# Altium PCB NB3000XN.PcbDoc (part 1 of 71)
Units mil, origin at the board's own origin, x right, y up, seen from the top; angles counter-clockwise.
Board outline 9527.56 x 6929.77 mil, 6 copper layers (Top Layer, GND+SHIELD, MidLayer1, MidLayer2, P2 - 3V3+5V0, Bottom Layer), stack 62.375 mil thick; 832 components, 1027 nets, 4655 pads, 4981 vias.
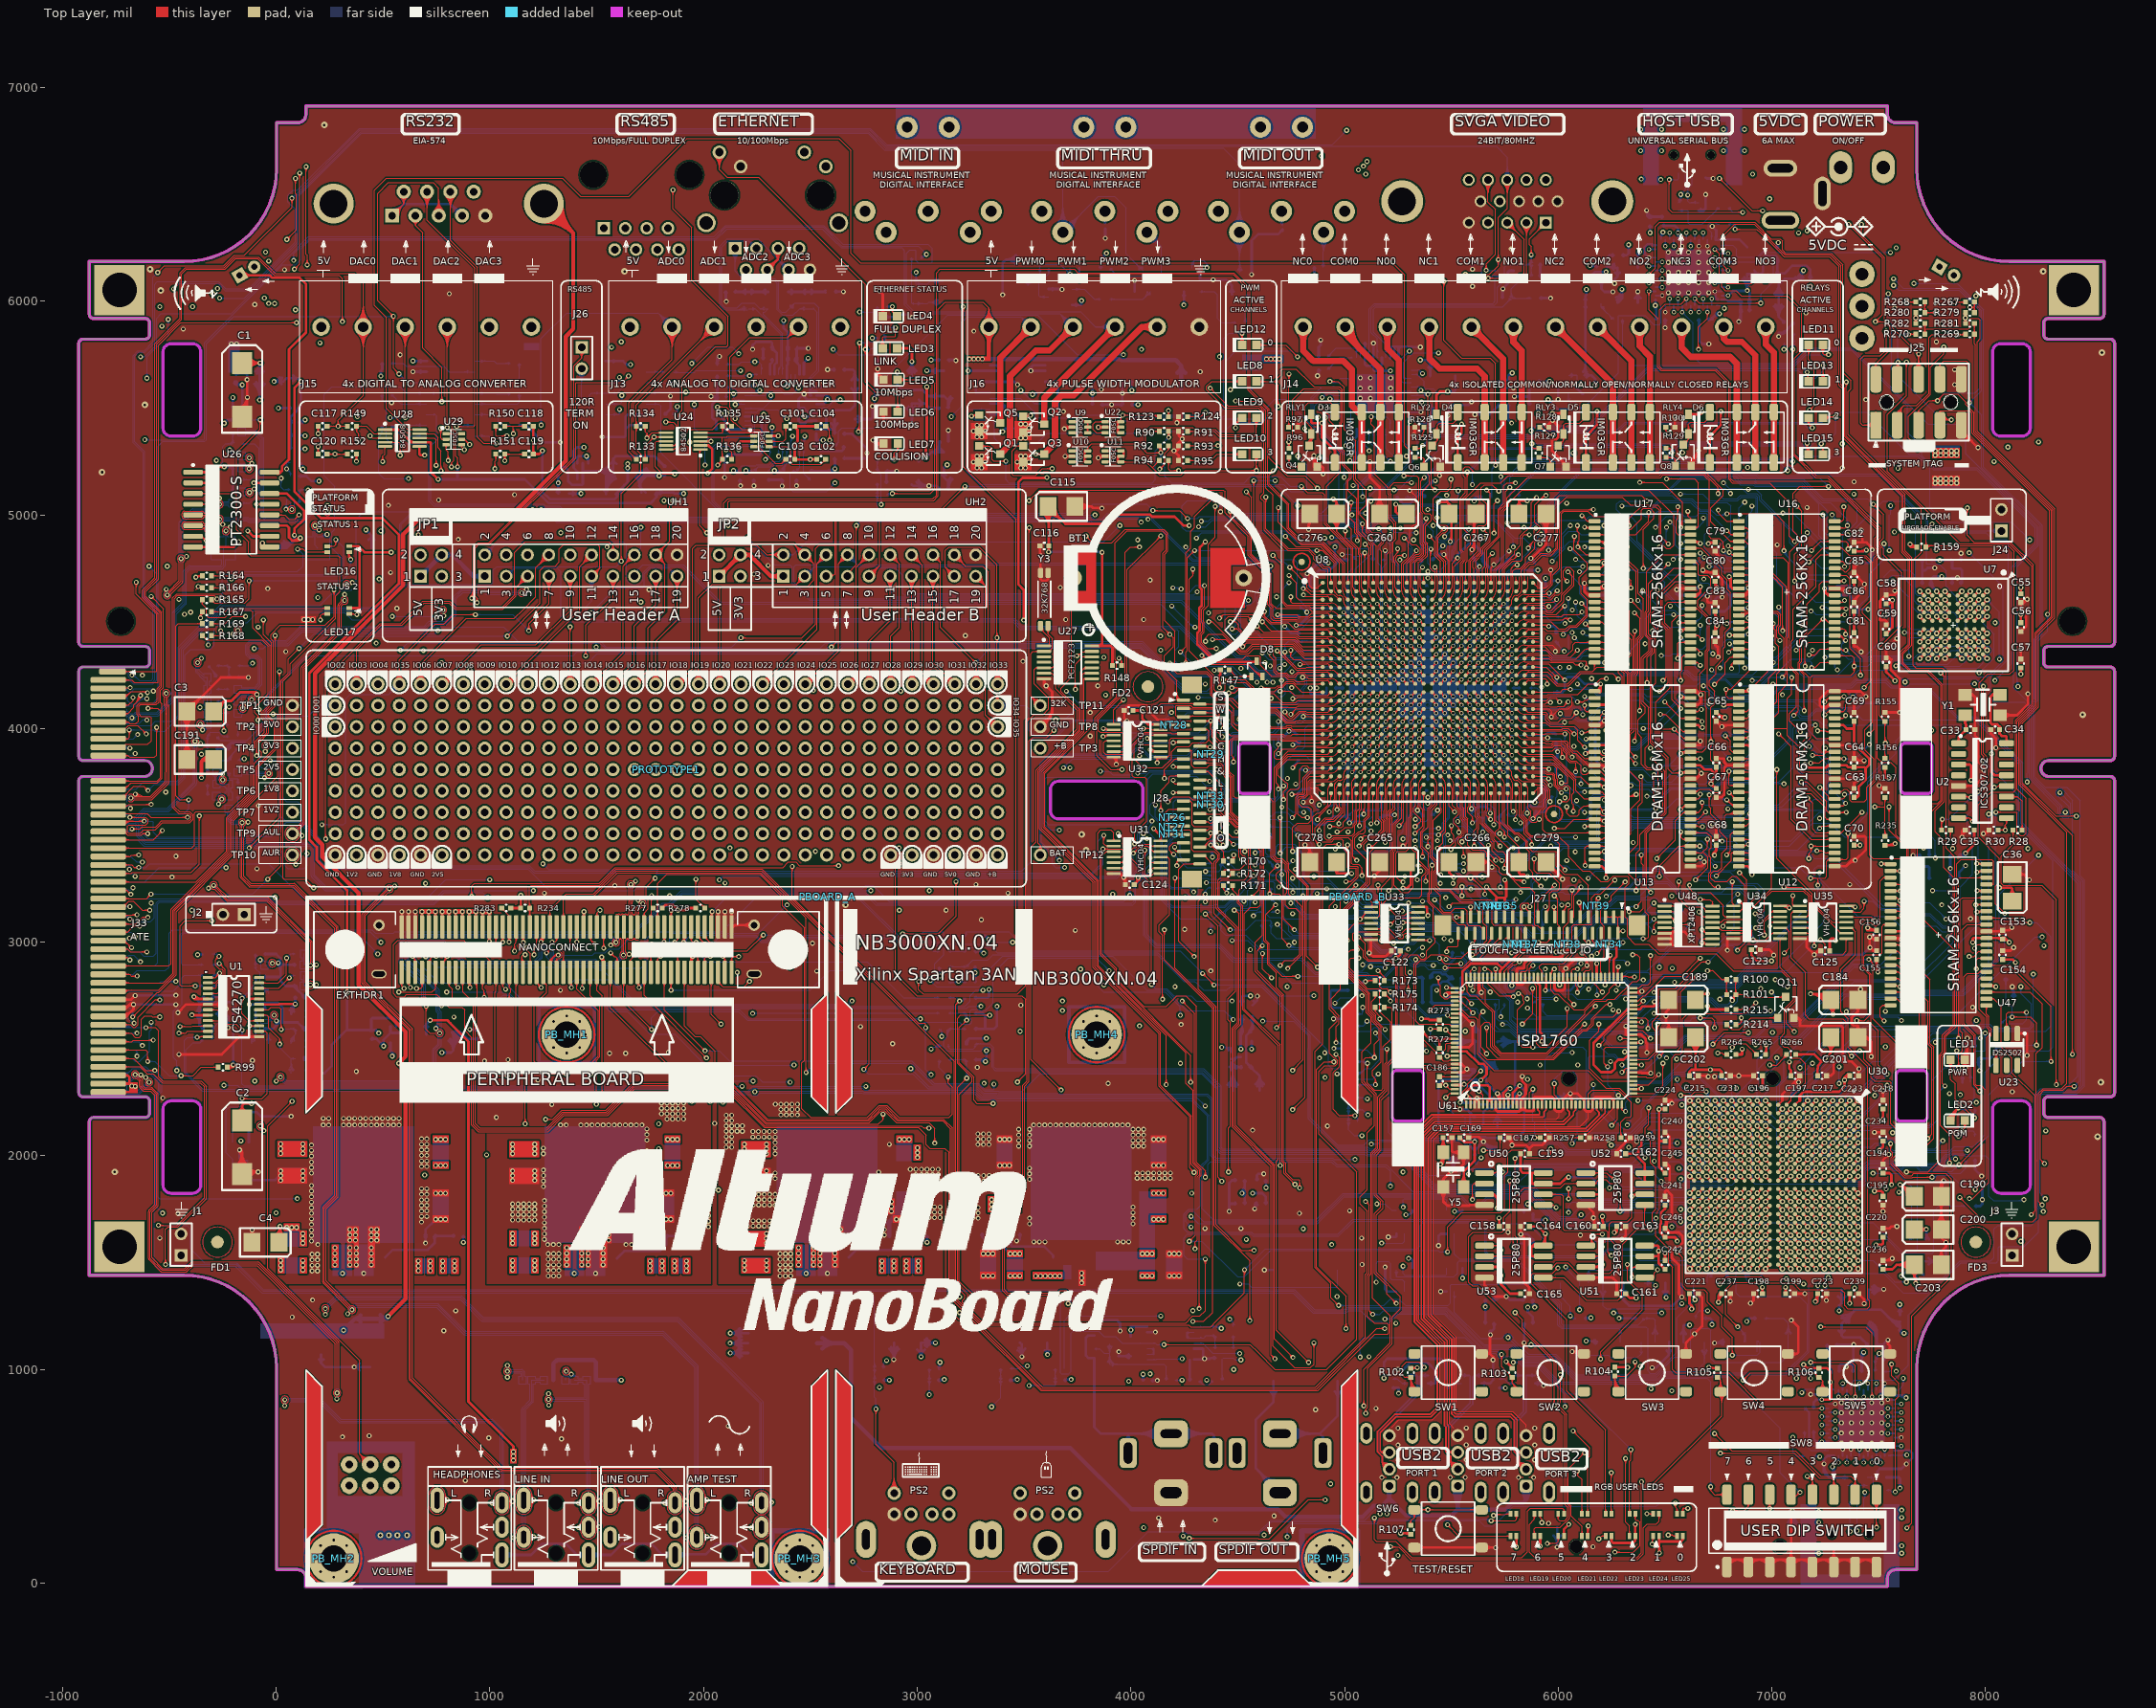
[diagram p0: Top Layer view]
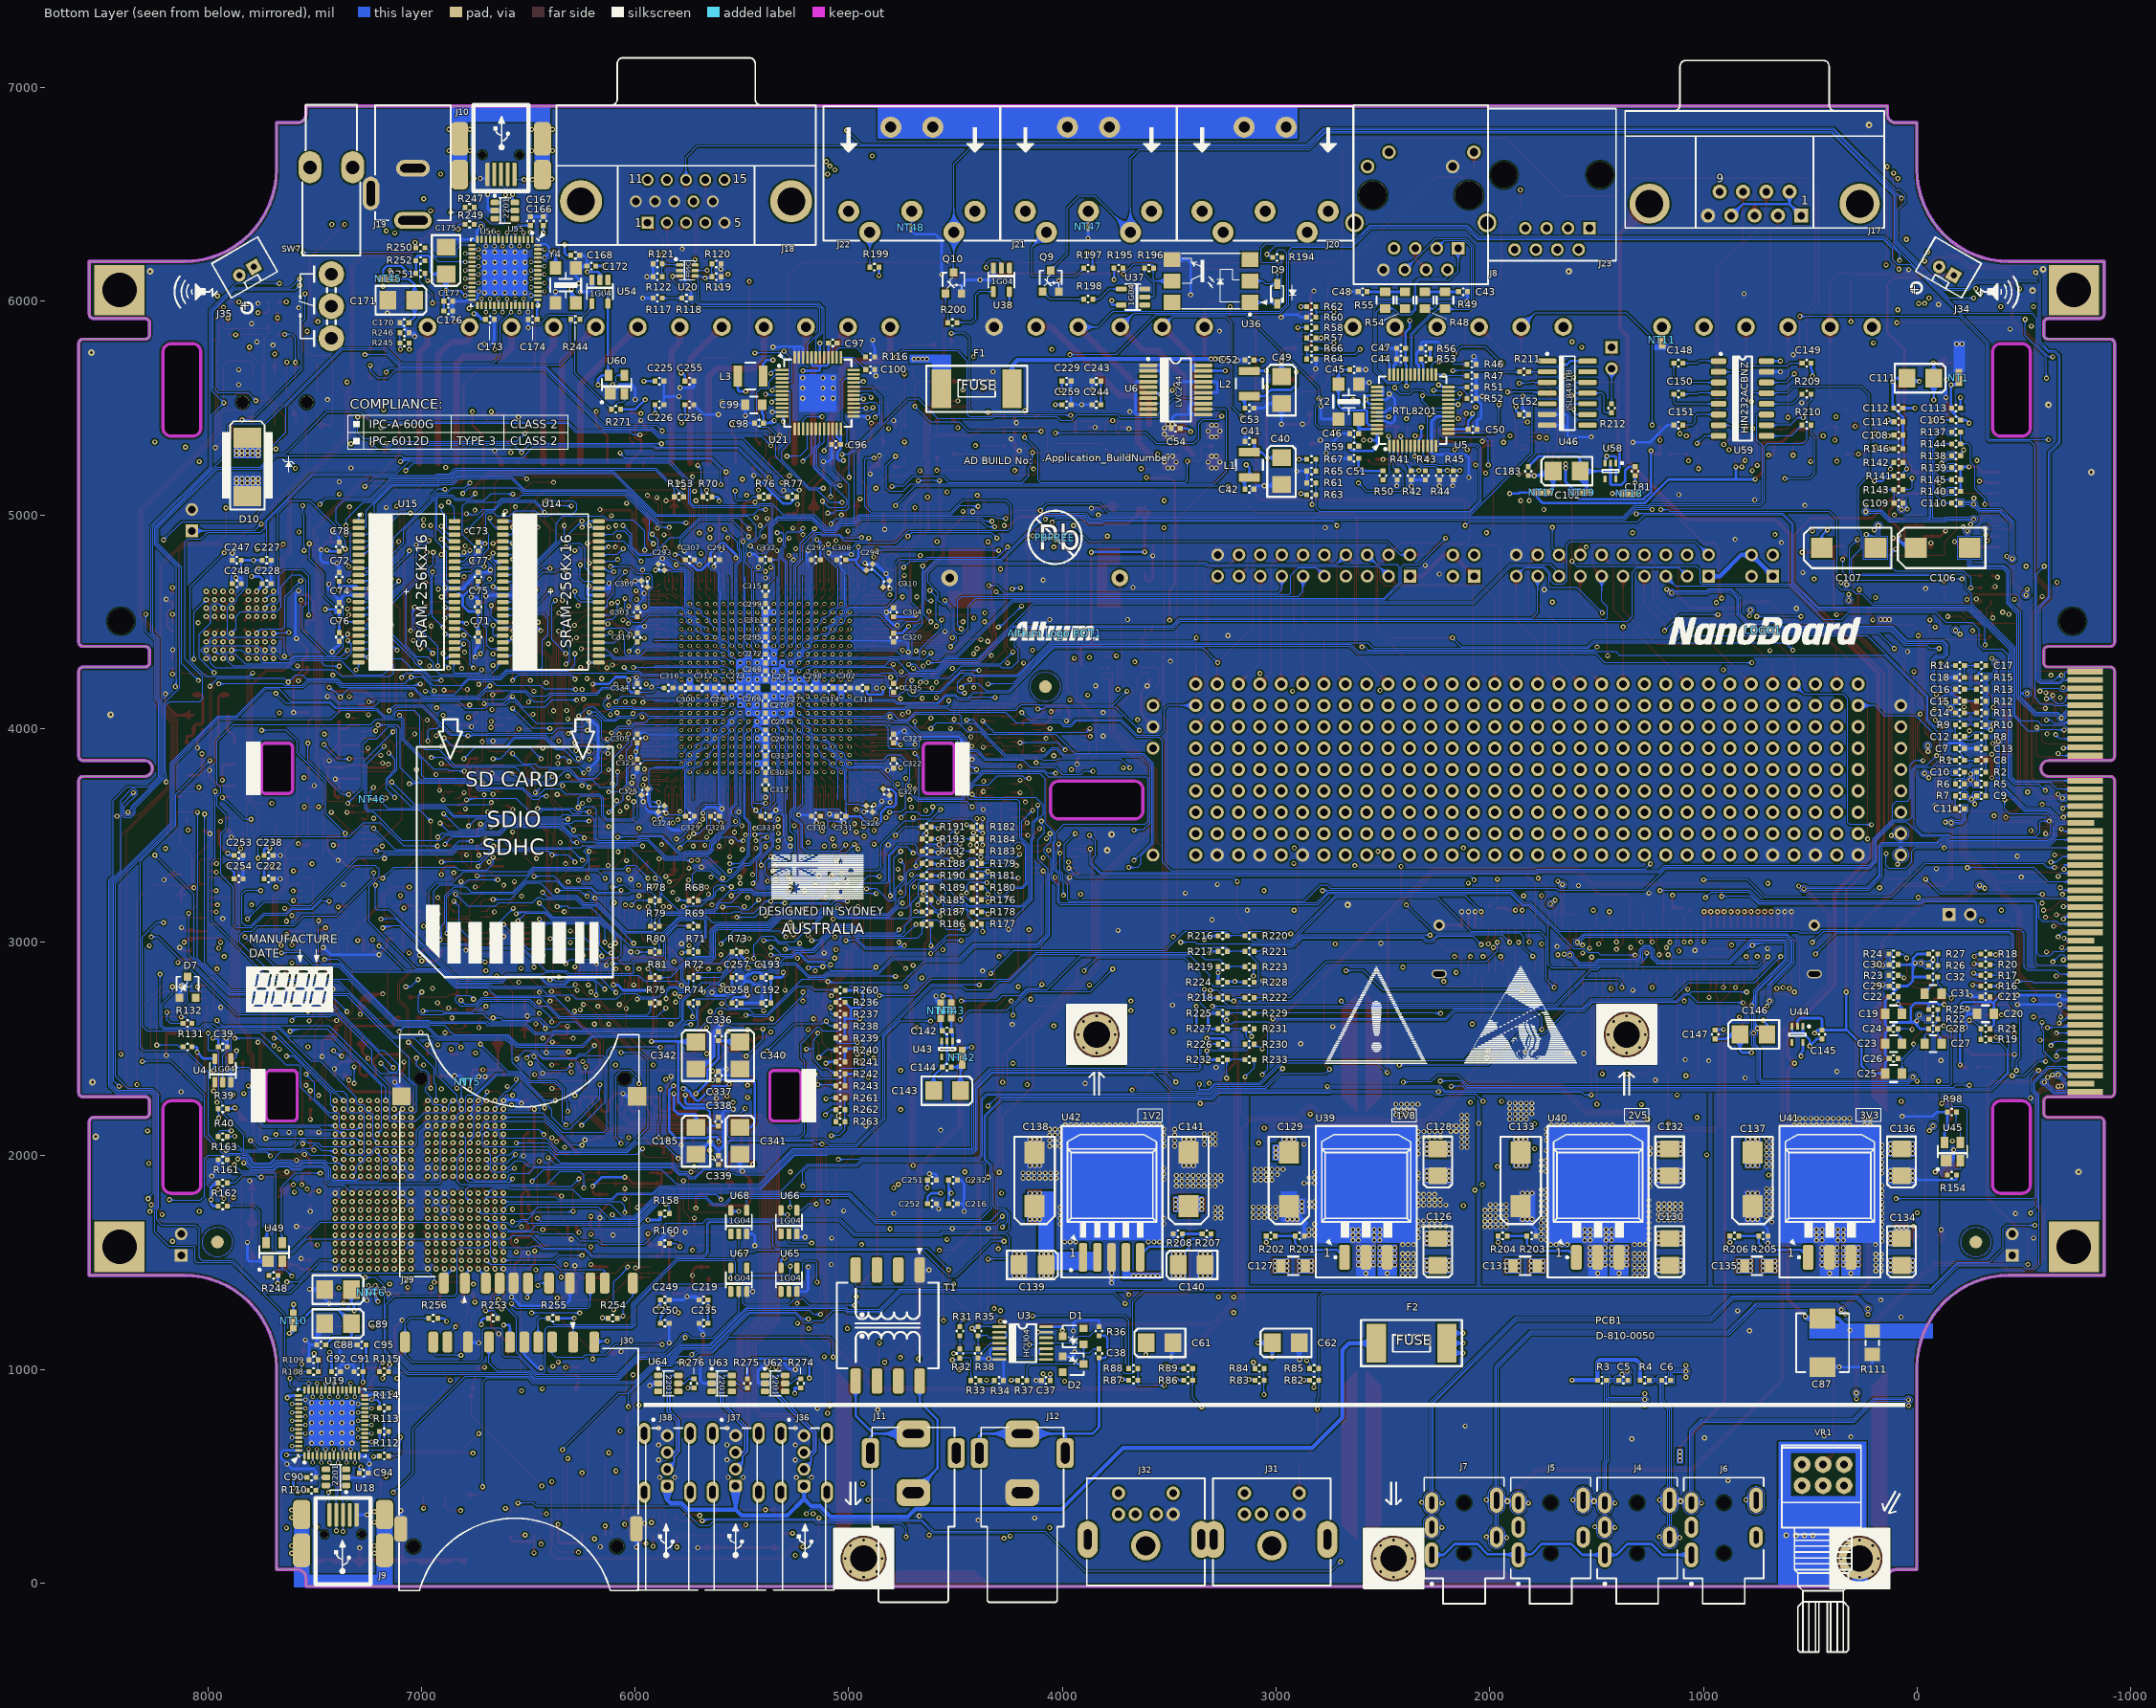
[diagram p1: Bottom Layer view, seen from below]
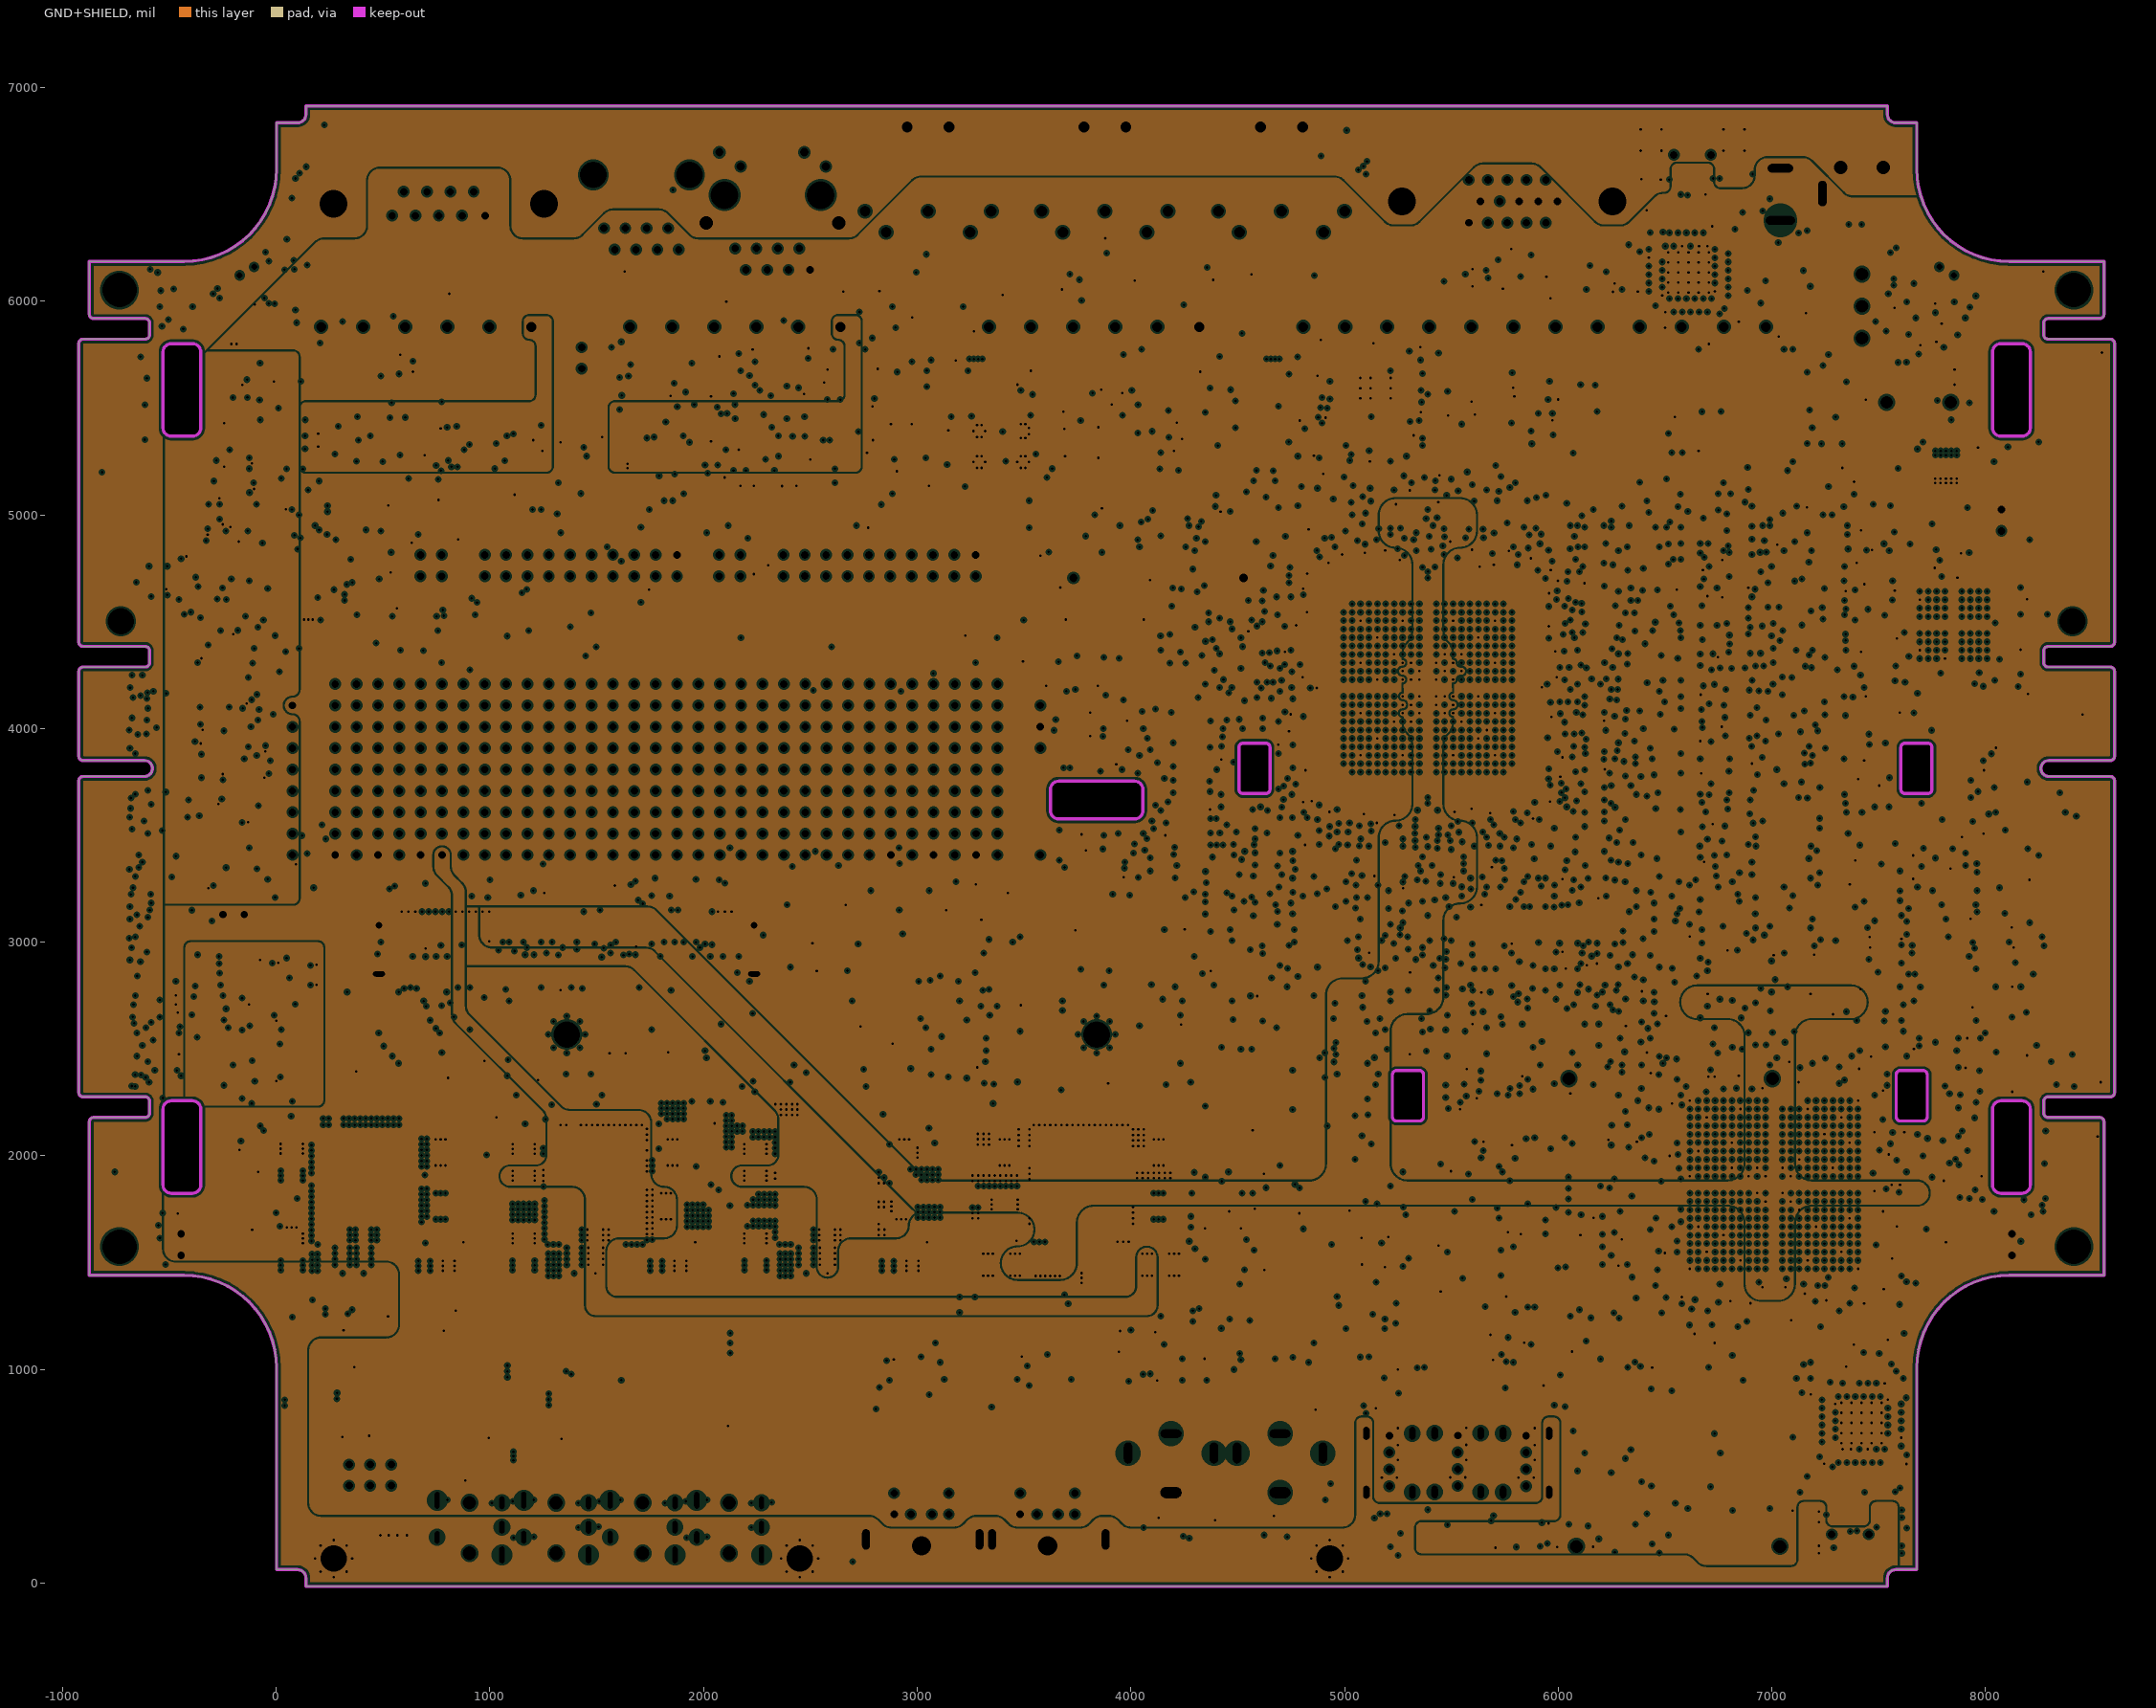
[diagram p2: GND+SHIELD, clearances drawn from the general rule]
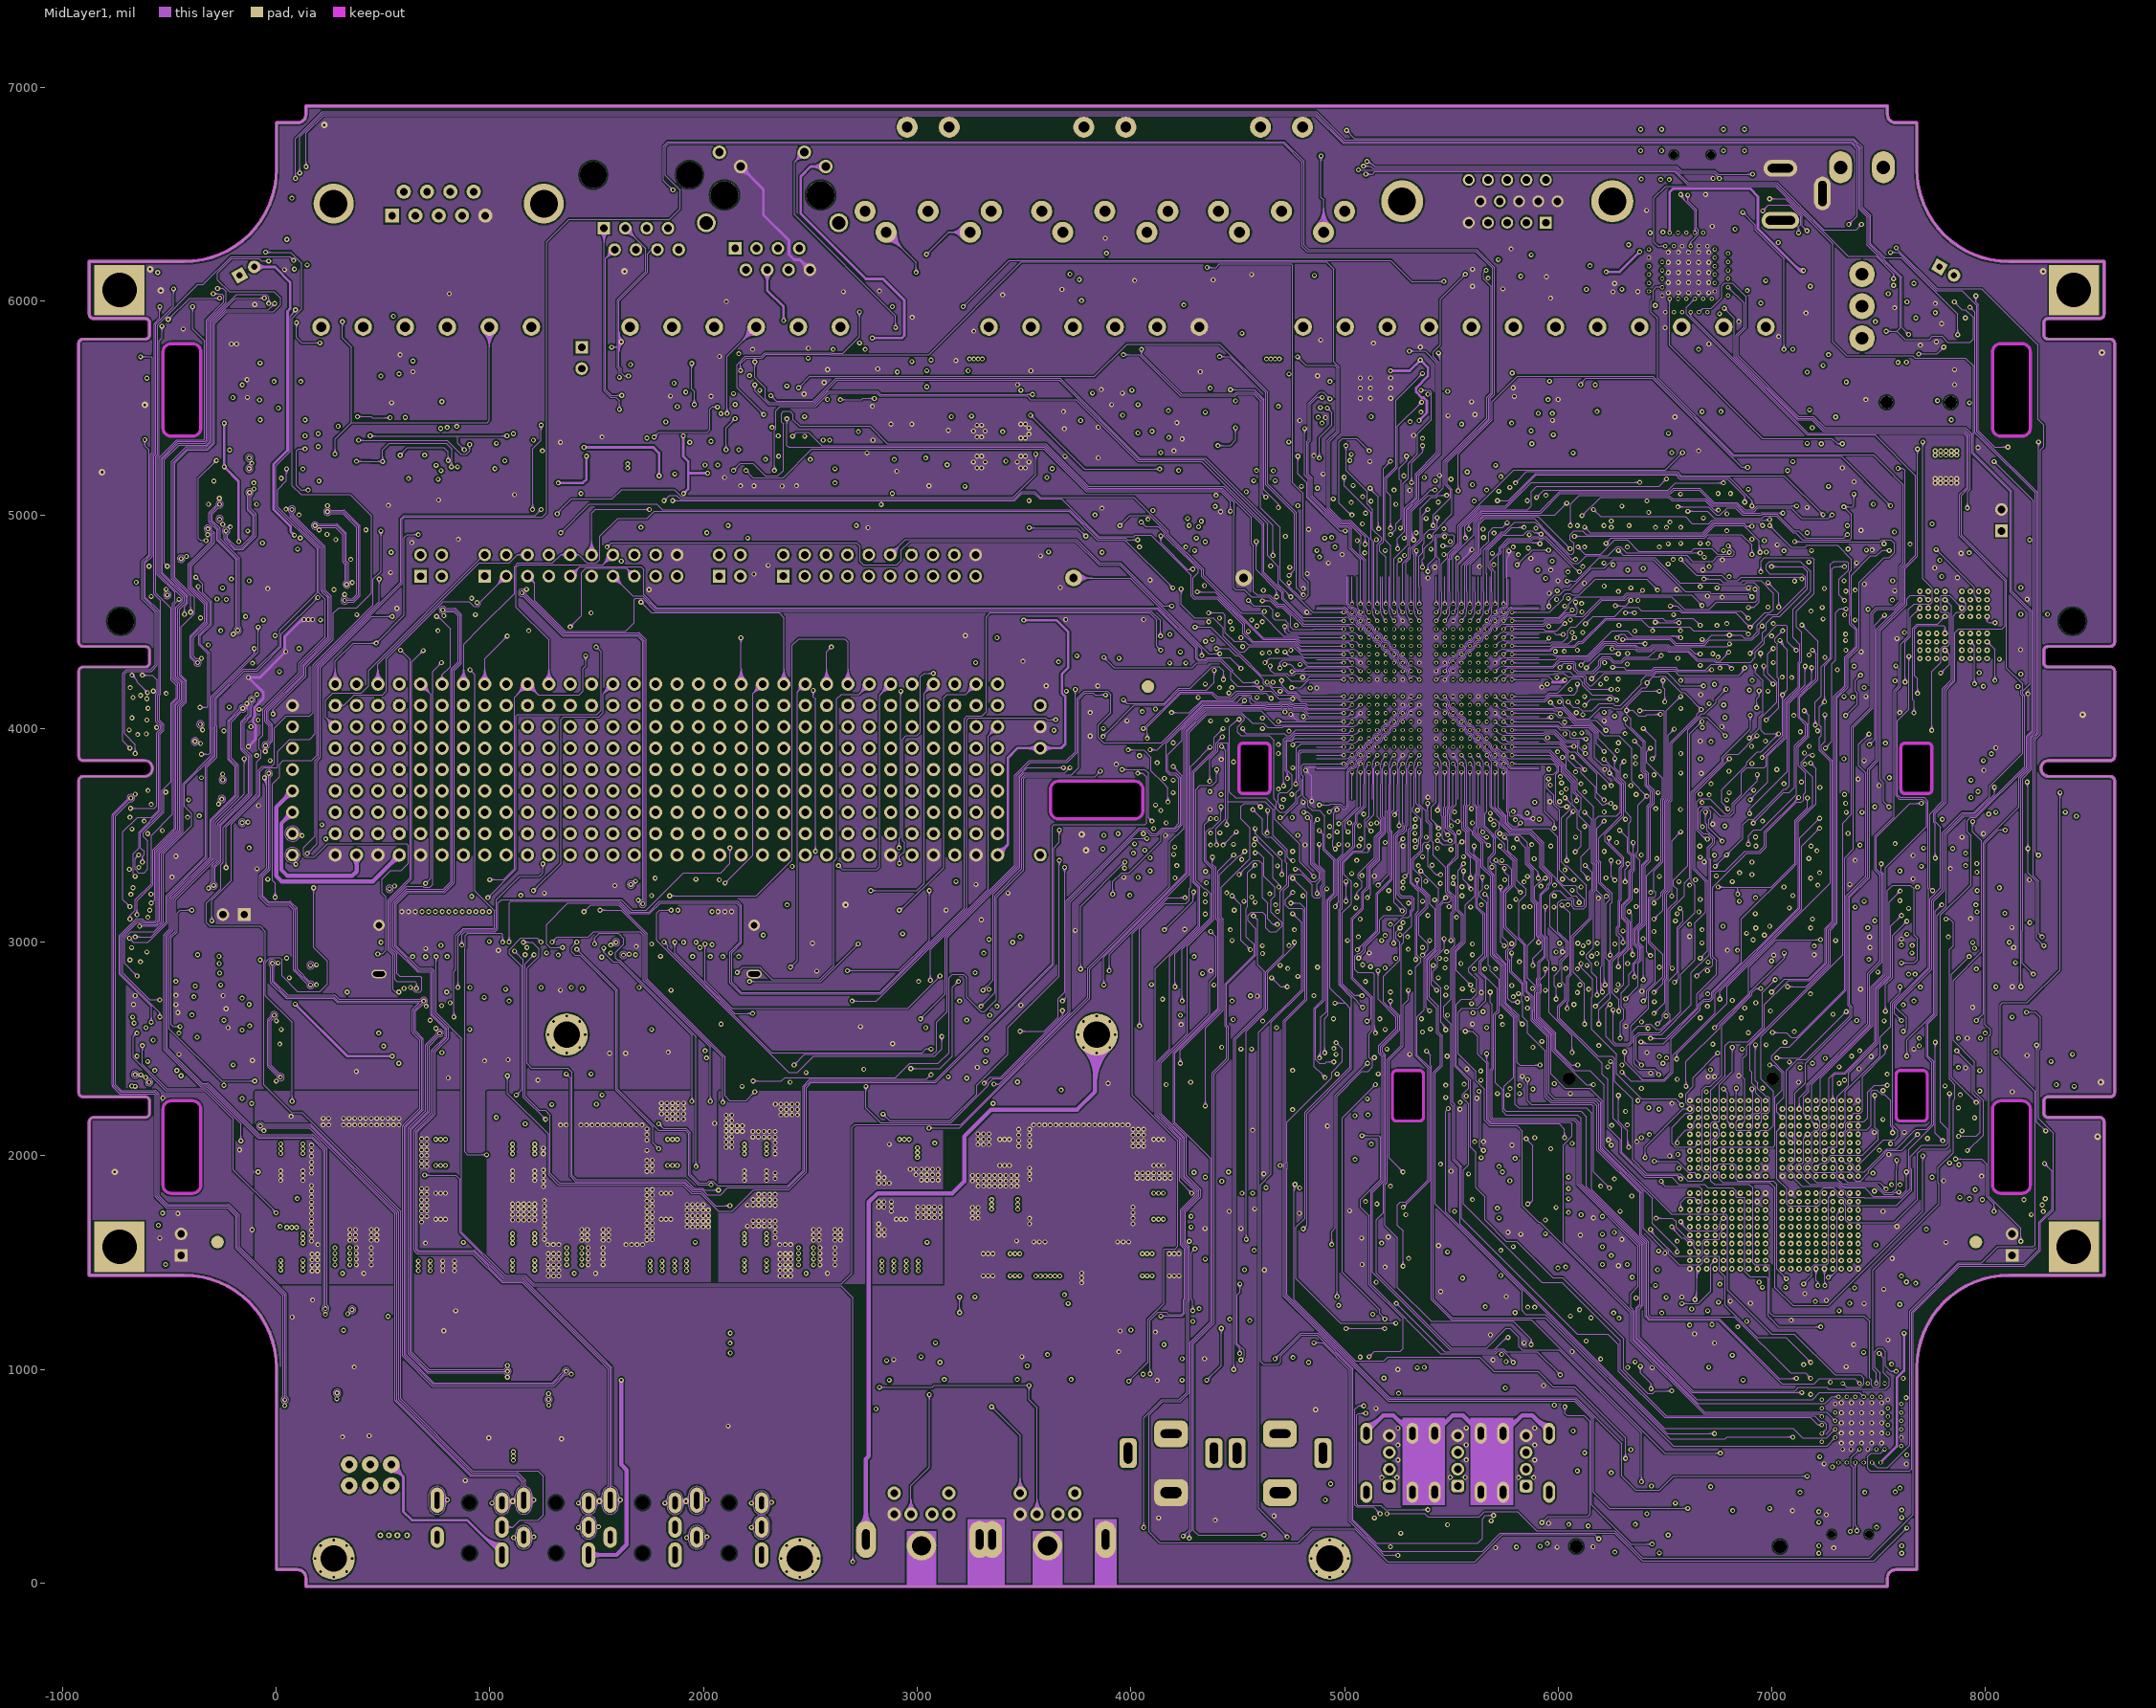
[diagram p3: MidLayer1]
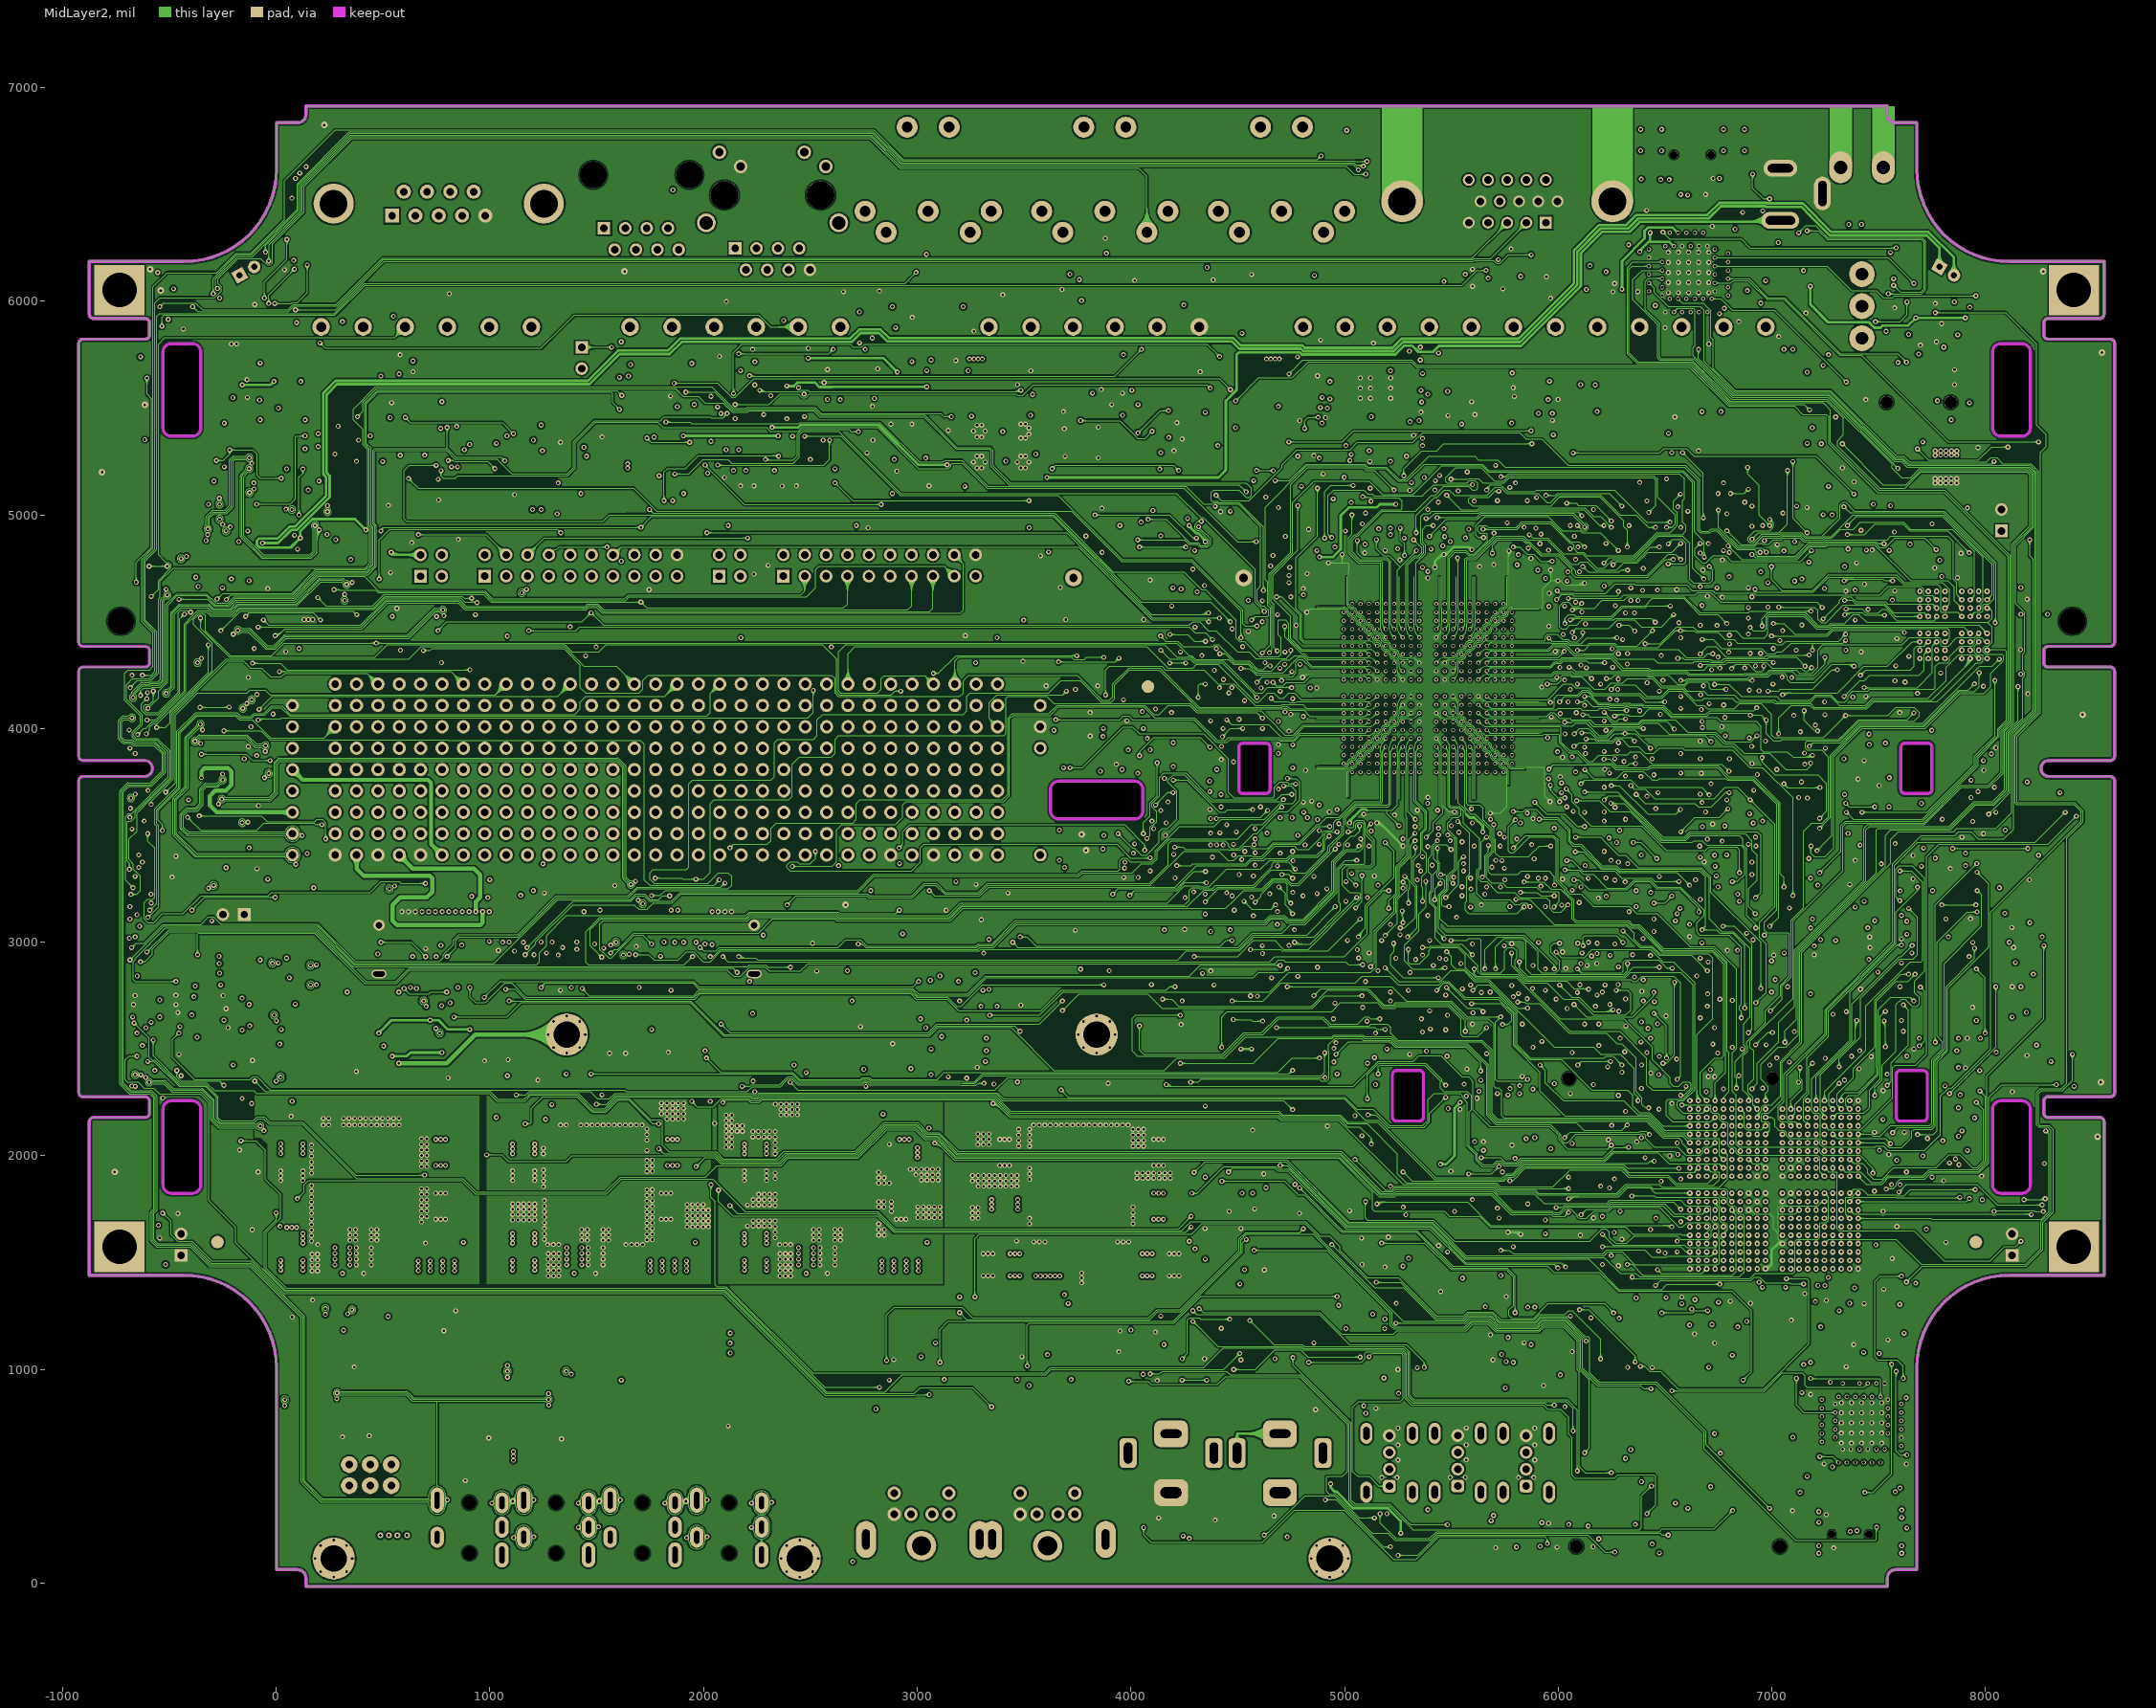
[diagram p4: MidLayer2]
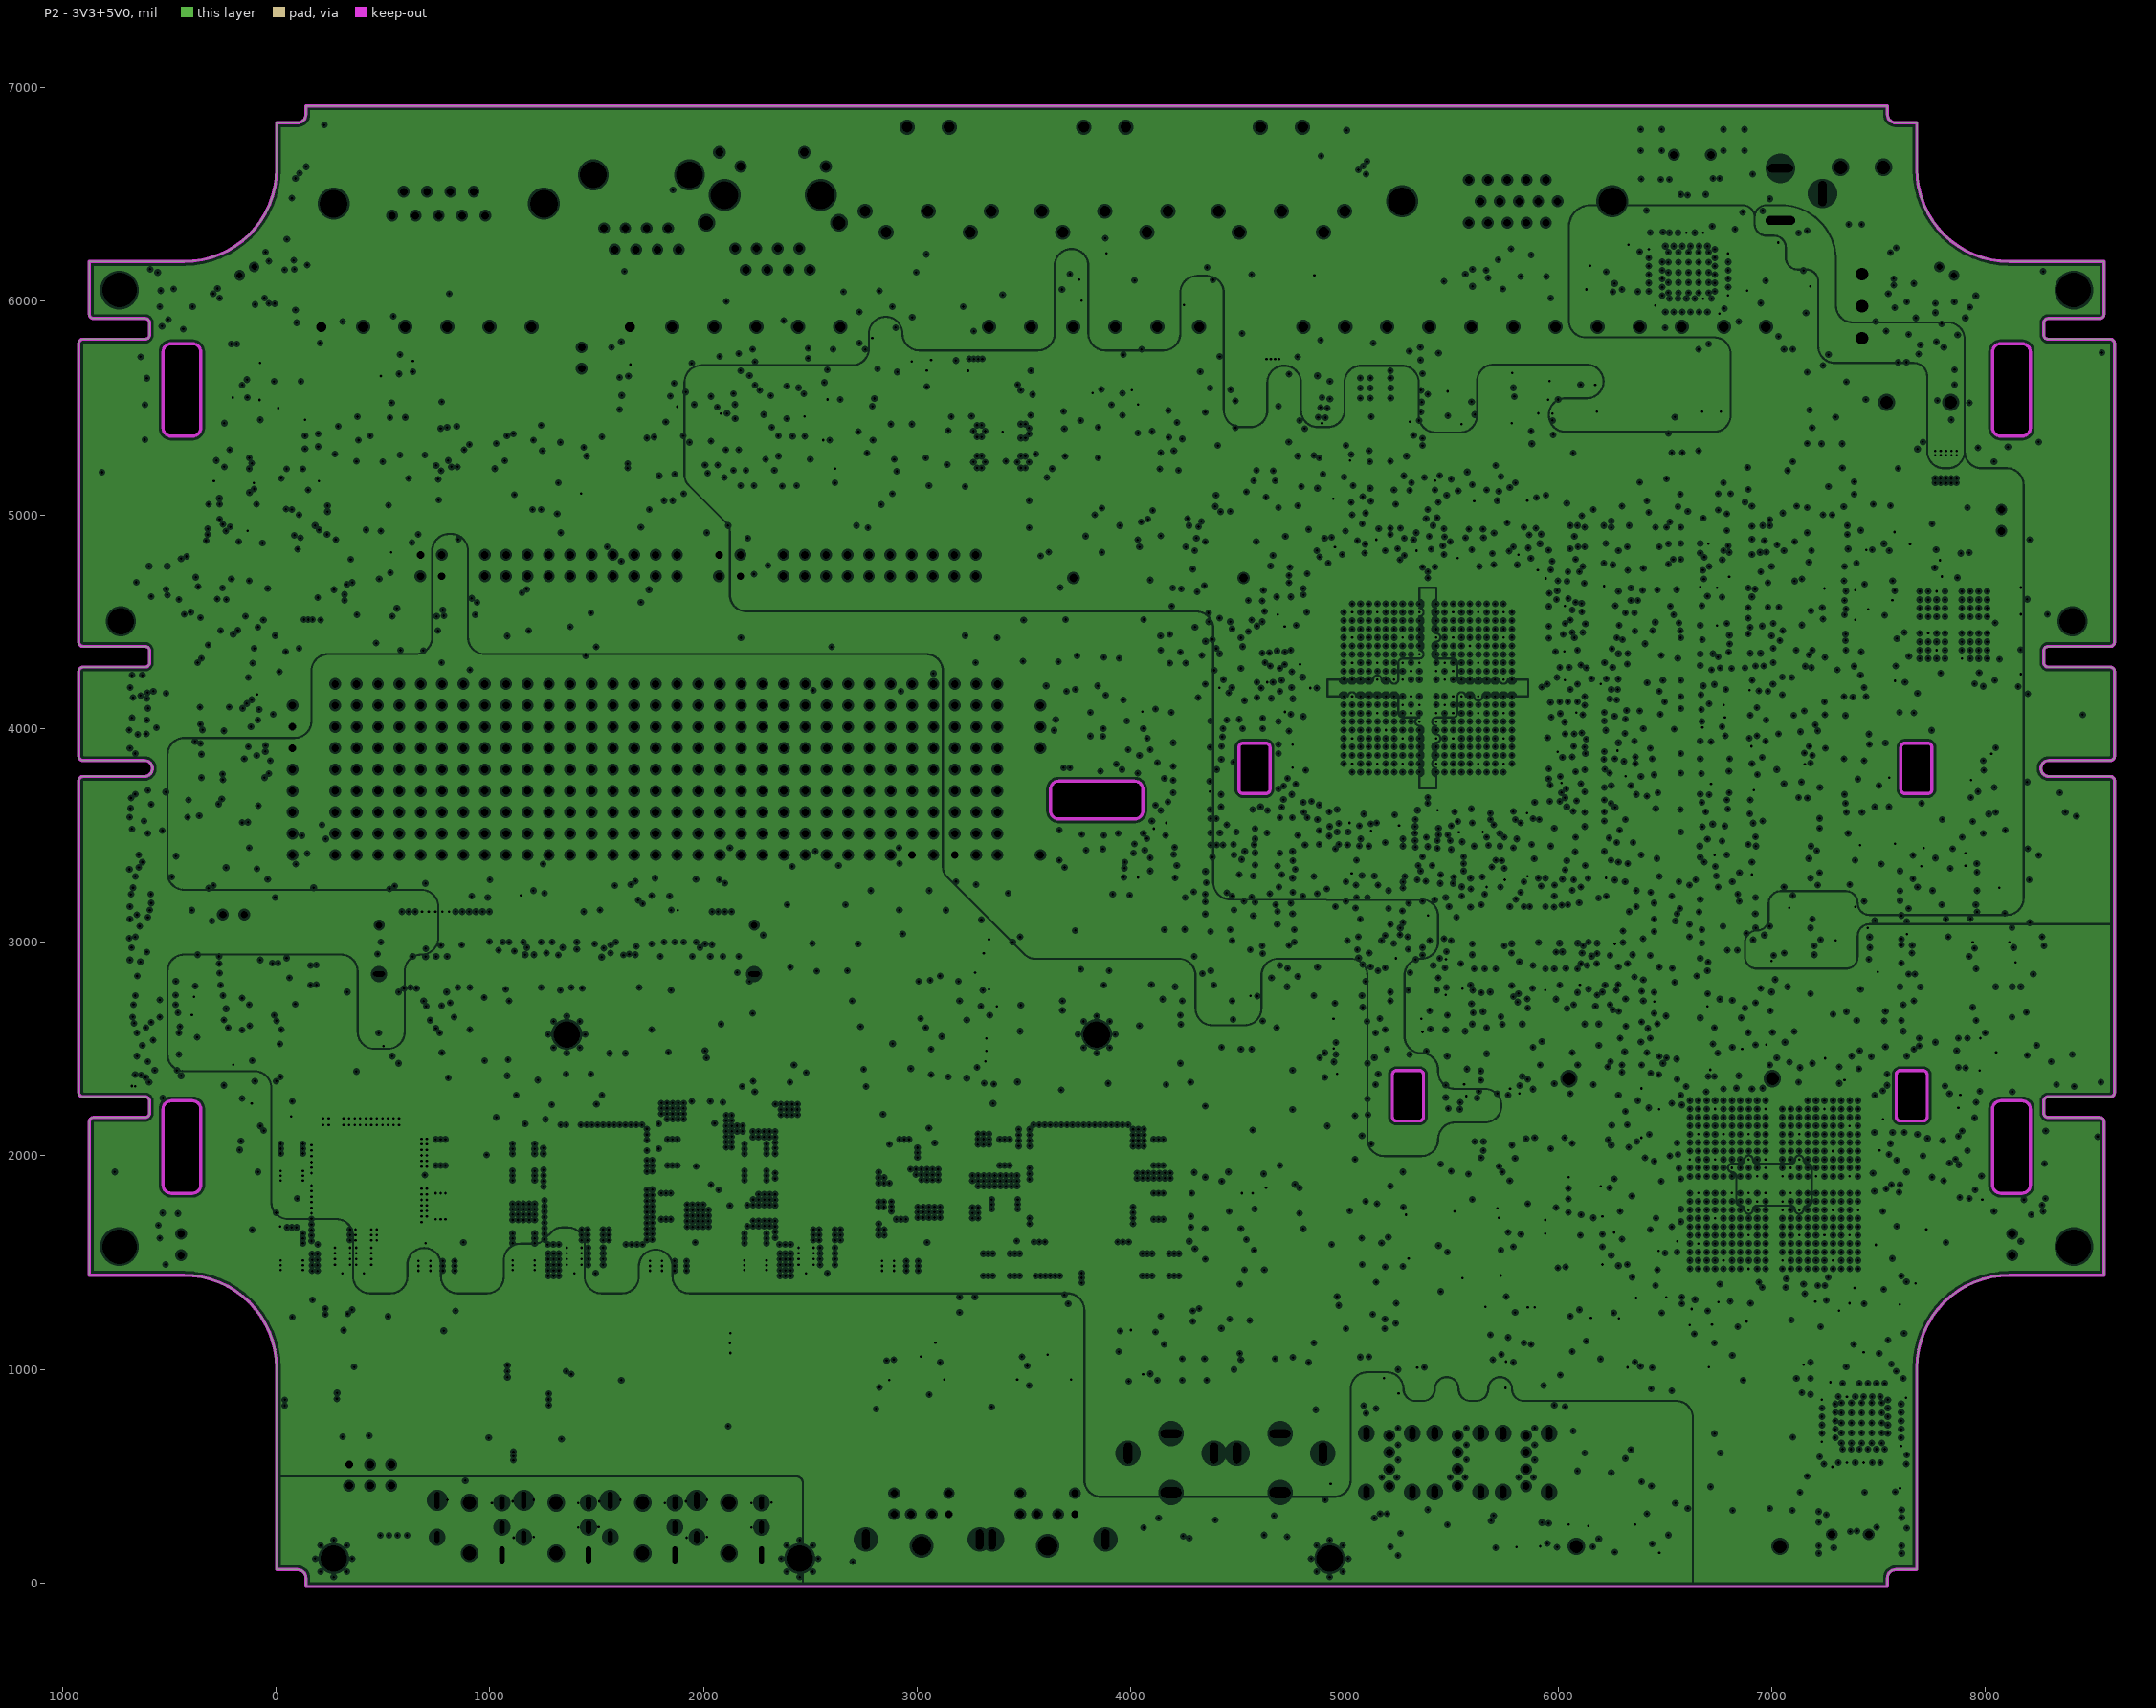
[diagram p5: P2 - 3V3+5V0, clearances drawn from the general rule]

## Layer stack, top to bottom
Top Layer: signal copper 1.4
Dielectric: core 7.874, FR-4, Dk 4.8
GND+SHIELD: plane copper 1.4173, net (Multiple Nets)
Dielectric: prepreg 12.9921, FR-4, Dk 4.8
MidLayer1: signal copper 1.4
Dielectric: core 7.874, FR-4, Dk 4.8
MidLayer2: signal copper 1.4
Dielectric: prepreg 12.6, FR-4, Dk 4.8
P2 - 3V3+5V0: plane copper 1.4173, net (Multiple Nets)
Dielectric: core 12.6, FR-4, Dk 4.8
Bottom Layer: signal copper 1.4

## Board outline
369 vertices, not listed, extent -923.8,-15.55 8603.76,6914.22
cut-out: 8170.69,2257.89 8179.45,2256.91 8187.77,2254 8195.24,2249.3 8201.47,2243.07 8206.16,2235.6 8209.07,2227.28 8210.06,2218.52 8210.06,1864.15 8209.07,1855.39 8206.16,1847.06 8201.47,1839.6 8195.24,1833.36 8187.77,1828.67 8179.45,1825.76 8170.69,1824.77 8072.26,1824.77 8063.5,1825.76 8055.18,1828.67 8047.72,1833.36 8041.48,1839.6 8036.79,1847.06 8033.88,1855.39 8032.89,1864.15 8032.89,2218.52 8033.88,2227.28 8036.79,2235.6 8041.48,2243.07 8047.72,2249.3 8055.18,2254 8063.5,2256.91 8072.26,2257.89
cut-out: 7707.86,2163.13 7601.56,2163.13 7597.18,2163.62 7593.02,2165.08 7589.29,2167.42 7586.17,2170.54 7583.83,2174.27 7582.37,2178.43 7581.87,2182.81 7581.87,2379.69 7582.37,2384.07 7583.83,2388.23 7586.17,2391.96 7589.29,2395.08 7593.02,2397.42 7597.18,2398.88 7601.56,2399.37 7707.86,2399.37 7712.24,2398.88 7716.4,2397.42 7720.13,2395.08 7723.25,2391.96 7725.6,2388.23 7727.05,2384.07 7727.54,2379.69 7727.54,2182.81 7727.05,2178.43 7725.6,2174.27 7723.25,2170.54 7720.13,2167.42 7716.4,2165.08 7712.24,2163.62
cut-out: 3623.45,3714.76 3624.43,3723.52 3627.34,3731.84 3632.03,3739.31 3638.27,3745.54 3645.73,3750.24 3654.05,3753.15 3662.81,3754.13 4017.15,3754.13 4025.91,3753.15 4034.23,3750.24 4041.69,3745.54 4047.93,3739.31 4052.62,3731.84 4055.53,3723.52 4056.52,3714.76 4056.52,3616.32 4055.53,3607.56 4052.62,3599.24 4047.93,3591.77 4041.69,3585.54 4034.23,3580.85 4025.91,3577.94 4017.15,3576.95 3662.81,3576.95 3654.05,3577.94 3645.73,3580.85 3638.27,3585.54 3632.03,3591.77 3627.34,3599.24 3624.43,3607.56 3623.45,3616.32
cut-out: -490.73,5368.5 -499.49,5369.49 -507.81,5372.4 -515.27,5377.09 -521.51,5383.32 -526.2,5390.79 -529.11,5399.11 -530.1,5407.88 -530.1,5762.25 -529.11,5771.01 -526.2,5779.33 -521.51,5786.8 -515.27,5793.03 -507.81,5797.72 -499.49,5800.64 -490.73,5801.62 -392.3,5801.62 -383.54,5800.64 -375.22,5797.72 -367.76,5793.03 -361.52,5786.8 -356.83,5779.33 -353.92,5771.01 -352.93,5762.25 -352.93,5407.88 -353.92,5399.11 -356.83,5390.79 -361.52,5383.32 -367.76,5377.09 -375.22,5372.4 -383.54,5369.49 -392.3,5368.5
cut-out: 8210.06,5762.25 8210.06,5407.88 8209.07,5399.11 8206.16,5390.79 8201.47,5383.32 8195.24,5377.09 8187.77,5372.4 8179.45,5369.49 8170.69,5368.5 8072.26,5368.5 8063.5,5369.49 8055.18,5372.4 8047.72,5377.09 8041.48,5383.32 8036.79,5390.79 8033.88,5399.11 8032.89,5407.88 8032.89,5762.25 8033.88,5771.01 8036.79,5779.33 8041.48,5786.8 8047.72,5793.03 8055.18,5797.72 8063.5,5800.64 8072.26,5801.62 8170.69,5801.62 8179.45,5800.64 8187.77,5797.72 8195.24,5793.03 8201.47,5786.8 8206.16,5779.33 8209.07,5771.01
cut-out: -530.1,1864.15 -530.1,2218.52 -529.11,2227.28 -526.2,2235.6 -521.51,2243.07 -515.27,2249.3 -507.81,2253.99 -499.49,2256.91 -490.73,2257.89 -392.3,2257.89 -383.54,2256.91 -375.22,2253.99 -367.76,2249.3 -361.52,2243.07 -356.83,2235.6 -353.92,2227.28 -352.93,2218.52 -352.93,1864.15 -353.92,1855.38 -356.83,1847.06 -361.52,1839.6 -367.76,1833.36 -375.22,1828.67 -383.54,1825.76 -392.3,1824.77 -490.73,1824.77 -499.49,1825.76 -507.81,1828.67 -515.27,1833.36 -521.51,1839.6 -526.2,1847.06 -529.11,1855.38
cut-out: 5243.76,2399.37 5350.06,2399.37 5354.43,2398.88 5358.6,2397.42 5362.33,2395.08 5365.45,2391.96 5367.79,2388.23 5369.25,2384.07 5369.74,2379.69 5369.74,2182.81 5369.25,2178.43 5367.79,2174.27 5365.45,2170.54 5362.33,2167.42 5358.6,2165.08 5354.43,2163.62 5350.06,2163.13 5243.76,2163.13 5239.37,2163.62 5235.21,2165.08 5231.48,2167.42 5228.37,2170.54 5226.02,2174.27 5224.57,2178.43 5224.07,2182.81 5224.07,2379.69 5224.57,2384.07 5226.02,2388.23 5228.37,2391.96 5231.48,2395.08 5235.21,2397.42 5239.37,2398.88
cut-out: 4505.53,3912.08 4506.03,3916.47 4507.48,3920.63 4509.83,3924.36 4512.95,3927.48 4516.68,3929.82 4520.84,3931.28 4525.22,3931.77 4631.52,3931.77 4635.9,3931.28 4640.06,3929.82 4643.79,3927.48 4646.91,3924.36 4649.25,3920.63 4650.71,3916.47 4651.21,3912.08 4651.21,3715.21 4650.71,3710.83 4649.25,3706.67 4646.91,3702.94 4643.79,3699.82 4640.06,3697.47 4635.9,3696.02 4631.52,3695.52 4525.22,3695.52 4520.84,3696.02 4516.68,3697.47 4512.95,3699.82 4509.83,3702.94 4507.48,3706.67 4506.03,3710.83 4505.53,3715.21
cut-out: 7623.64,3931.77 7729.94,3931.77 7734.32,3931.28 7738.48,3929.82 7742.21,3927.48 7745.33,3924.36 7747.67,3920.63 7749.13,3916.47 7749.62,3912.08 7749.62,3715.21 7749.13,3710.83 7747.67,3706.67 7745.33,3702.94 7742.21,3699.82 7738.48,3697.47 7734.32,3696.02 7729.94,3695.52 7623.64,3695.52 7619.26,3696.02 7615.1,3697.47 7611.37,3699.82 7608.25,3702.94 7605.9,3706.67 7604.45,3710.83 7603.95,3715.21 7603.95,3912.08 7604.45,3916.47 7605.9,3920.63 7608.25,3924.36 7611.37,3927.48 7615.1,3929.82 7619.26,3931.28

## Design rules (kind name [scope] priority, off if disabled: settings)
Clearance Polygons [InPolygon] p1: gap=8
Clearance "General Clearance" [All] p2: gap=4
ComponentClearance "Small SMD" [HasFootprint('RESC1005-STAR') or Hasfootprint('CAPC3528-STAR') or Hasfootprint('0603LED')   or Hasfootprint('CAPC1005-STAR')] p1: gap=-39.37 collisioncheckmode=3 verticalgap=10 showdistances=FALSE
ComponentClearance "Peripheral and Daughter" [InComponentClass('Plug In Boards') vs InComponentClass('Plug In Board Headers') or HasFootprint('STANDOFF_SOLDER_3MM')] p2: gap=0 collisioncheckmode=3 verticalgap=0 showdistances=FALSE
ComponentClearance "Net Ties" [IsNetTieComponent] p3: gap=-39.37 collisioncheckmode=3 verticalgap=-39.37 showdistances=FALSE
ComponentClearance [All] p4: gap=7.87 collisioncheckmode=3 verticalgap=39.37 showdistances=FALSE
DiffPairsRouting DiffPair_DiffPairsRouting [All] p1: maxlimit=12.6 minlimit=11.02 mostfreqgap=11.81 maxuncoupledlength=500
DiffPairsRouting PairRoute [All] p2: maxlimit=5.91 minlimit=5 mostfreqgap=5 maxuncoupledlength=393.7
FabricationTestPointUsage TestPointUsage [All] p1 off: valid=0 allowmultiple=FALSE
FabricationTestpoint Testpoint [All] p1 off: side=3 testpointundercomponent=TRUE minsize=40 maxsize=100 preferedsize=60 minholesize=0 maxholesize=40 preferedholesize=32 testpointgrid=1 allowsidetop=TRUE allowsidebottom=TRUE usegrid=TRUE gridtolerance=0.01
FanoutControl Fanout_BGA [All] p1: bgadir=Out bgaviamode=Centered fanoutstyle=BGA fanoutdirection=OutOnly viagrid=1 // Fanout_BGA (Default Rule)
FanoutControl Fanout_Default [All] p5: bgadir=Out bgaviamode=Centered fanoutstyle=BGA fanoutdirection=Alternating viagrid=1 // Fanout_Default (Default Rule)
HoleSize [IsPad And (holesize <> 0)] p1: absolutevalues=TRUE maxlimit=204.72 minlimit=11.81 maxpercent=80.000 minpercent=20.000
MatchedLengths DiffPair_MatchedLengths [(IsDifferentialPair And (Name = 'USB_DP'))] p1: tolerance=393.7 checknetsindiffpair=TRUE checkdiffpairvsdiffpair=TRUE checkothers=TRUE
MatchedLengths DiffPair_MatchedLengths_1 [(IsDifferentialPair And (Name = 'DIFF_RX1'))] p2: tolerance=1000 checknetsindiffpair=TRUE checkdiffpairvsdiffpair=TRUE checkothers=TRUE
MinimumAnnularRing [PadIsPlated And (Name <> 'Y1_RT')] p1 off: minimumring=7.87
PlaneClearance [All] p1: clearance=10
PlaneConnect [All] p1: planeconnectstyle=Direct reliefexpansion=20 reliefentries=4 reliefconductorwidth=10 reliefairgap=10
PolygonConnect [All] p1: connectstyle=Direct reliefconductorwidth=10 reliefentries=4 polygonreliefangle="90 Angle"
RoutingVias [All] p1: holewidth=11.81 width=23.62 viastyle="Through Hole" minholewidth=11.81 minwidth=23 maxholewidth=39.37 maxwidth=78.74
ShortCircuit ShortCircuit_1 [Net = 'No Net' vs Net = 'No Net'] p1: allowed=TRUE
ShortCircuit [All] p2: allowed=FALSE
SilkscreenOverComponentPads [All] p1: minsilkscreentomaskgap=10
SolderMaskExpansion SolderMaskExpansion_Vias [IsVia] p1: expansion=-30
SolderMaskExpansion [All] p2: expansion=1.5
Width [All] p1: maxlimit=157.48 minlimit=4 preferedwidth=5
17 further rules are at their usual default settings.

## Classes and differential pairs
channel class FPGA_Bypass_3V3: DECOUPLING_CAPS_3V31 DECOUPLING_CAPS_3V32
channel class FPGA_Bypass_1V2: DECOUPLING_CAPS_1V21 DECOUPLING_CAPS_1V22
channel class USB_CY7C68001-56LFC: DBUSB_TXRX1 DBUSB_TXRX2
channel class PSU_ZXCL330_3V3: PSU_A3V3_ADC1 PSU_A3V3_ADC2 PSU_A3V3_CODEC PSU_A3V3_DAC
channel class PSU_1084_ADJ: PSU_1V8 PSU_2V5 PSU_3V3
channel class LED_RGB_SMDx2: HOST_LED U_LED_01 U_LED_23 U_LED_45 U_LED_67
channel class CON_SD_KSDC012551: CON_DBSD1 CON_DBSD2
channel class SRAM_256Kx16_TSOP44: U_SRAM1 U_SRAM2
channel class RELAY_SMT_5V_IM03GR: U_RELAY0 U_RELAY1 U_RELAY2 U_RELAY3
pad class "GND Net Link Pads": NT1-2 NT2-1 NT2-2 U13-11
pad class Connector_Slot_Pads: J6-1 J6-3 J7-1 J7-2 J7-3 U1MIC-6
polygon class HeatsinkPolygons: POWER-BL-1V2 POWER-BL-1V8 POWER-BL-2V5 POWER-BL-3V3 POWER-BL-VCCX POWER-TL-1V2 POWER-TL-1V8 POWER-TL-2V5 POWER-TL-3V3 POWER-TL-VCCX
channel class PC_PS2: KEYBOARD MOUSE
component class StatusLEDS: C39 LED1 LED2 R39 R40 U4
channel class PWRCTRL_RELAY_PWM_28V2A: PWRPWM0 PWRPWM1 PWRPWM2 PWRPWM3
channel class CON_PS2PORT_MINIDIN6F_BLACK: CON_KEYBOARD CON_MOUSE
channel class CON_MINI_USBB_RA_KME04-USBMU03A01-1: CON_DBUSB CON_USB
channel class FLASH_M25PX0_SPI_8Mbit: GOLDEN SYSBOOT
channel class CON_USBA_RA_UPRIGHT: CON_USB1 CON_USB2 CON_USB3
component class ADC: C101 C102 C103 C104 R133 R134 R135 R136 U24 U25
component class AMP_PT2300: C105 C106 C107 C108 C109 C110 C111 C112 C113 C114 R137 R138 R139 R140 R141 R142 R143 R144 R145 R146 U26
component class "ATE INTERFACE": J33
component class AUDIO_AMP: C5 C6 C7 C8 C9 C10 C11 C12 C13 C14 C15 C16 C17 C18 R1 R2 R3 R4 R5 R6 R7 R8 R9 R10 R11 R12 R13 R14 R15 TP9 TP10 VR1
component class CLK_PLL: C33 C34 C35 C36 R28 R29 R30 U2 Y1
component class CODEC_CS4270: C19 C20 C21 C22 C23 C24 C25 C26 C27 C28 C29 C30 C31 C32 R16 R17 R18 R19 R20 R21 R22 R23 R24 R25 R26 R27 U1
component class COM_FLASH: C55 C56 C57 C58 C59 C60 U7
component class COM_SDRAM: C63 C64 C65 C66 C67 C68 C69 C70 U12 U13
component class COM_SRAM: C79 C80 C81 C82 C83 C84 C85 C86 U16 U17
component class COMP_5V0: J19 SW7
component class CON_ADC: J13
component class CON_AUDIO: J4 J5 J6 J7
component class CON_BATT: BT1
component class CON_DAC: J15
component class CON_DBSD1: J29 R253 R254 U65 U66
component class CON_DBSD2: J30 R255 R256 U67 U68
component class CON_DBUSB: J9
component class CON_ETH: J8
component class CON_IO: JP1 JP2 UH1 UH2
component class CON_KEYBOARD: J31
component class CON_MIDI: J20 J21 J22
component class CON_MOUSE: J32
component class CON_PSU: D10 J19 SW7
component class CON_PWM: J16
component class CON_RELAY: J14
component class CON_RS232: J17
component class CON_RS485: J23
component class CON_SPDIF: C37 C38 D1 D2 J11 J12 R31 R32 R33 R34 R35 R36 R37 R38 T1 U3
component class CON_USB1: J36
component class CON_USB2: J37
component class CON_USB3: J38
component class CON_USB: J10
component class CON_VGA: J18
component class DAC: C117 C118 C119 C120 R149 R150 R151 R152 U28 U29
component class DBUSB_TXRX1: 2222222 C170 C171 C172 C173 C174 C175 C176 C177 NT45 R245 R246 R247 R249 R250 R251 R252 R271 U55 U56 U60
component class DBUSB_TXRX2: C88 C89 C90 C91 C92 C93 C94 C95 NT10 R108 R109 R110 R112 R113 R114 R115 R248 U18 U19 U49
component class ETH: C40 C41 C42 C43 C44 C45 C46 C47 C48 C49 C50 C51 C52 C53 C54 L1 L2 LED3 LED4 LED5 LED6 LED7 R41 R42 R43 R44 R45 R46 R47 R48 R49 R50 R51 R52 R53 R54 R55 R56 R57 R58 R59 R60 R61 R62 R63 R64 R65 R66 R67 U5 U6 Y2
component class GOLDEN: C158 C159 U50
component class HOST_DECOUPLING_CAPS_1V2: C260 C265 C266 C267 C268 C269 C270 C271 C272 C273 C274 C275
component class HOST_DECOUPLING_CAPS_3V3: C276 C277 C278 C279 C291 C292 C293 C294 C295 C296 C297 C298 C299 C300 C301 C302 C303 C304 C305 C307 C308 C309 C310 C311 C312 C313 C314 C315 C316 C317 C318 C319 C320 C321 C322 C323 C324 C325 C326 C327 C328 C329 C330 C331 C332 C333 C334 C335
component class HOST_JTAG: J25
component class HOST_NonIO: R161 R162 R163 R267 R268 R269 R270 R279 R280 R281 R282
component class "JTAG CONFIG": R216 R217 R218 R219 R220 R221 R222 R223 R224 R225 R226 R227 R228 R229 R230 R231 R232 R233
component class KEYBOARD: C61 R82 R83 R84 R85
component class CON_LCDTFT: J27 NT34 NT35 NT36 NT37 NT38 NT39 NT40 NT41 Q11 R100 R101 R214
component class LED_HOST: C121 LED16 LED17 R164 R165 R166 R167 R168 R169 U31
component class "MIDI INTERFACE": D9 NT47 NT48 Q9 Q10 R194 R195 R196 R197 R198 R199 R200 U36 U37 U38
component class MOUNTS: "Altium Logo BOT1" FD1 FD2 FD3 JUMPER1 JUMPER2 JUMPER3 JUMPER4 LOGO1 PB_MH1 PB_MH2 PB_MH3 PB_MH4 PB_MH5 PCB1
component class MOUSE: C62 R86 R87 R88 R89
component class NB_ID: D7 R131 R132 U23
component class PBA: EXTHDR1 R234
component class PDA_SWITCHES: R102 R103 R104 R105 R106 SW1 SW2 SW3 SW4 SW5
component class PSU_1V2: C138 C139 C140 C141 U42
component class PSU_1V8: C126 C127 C128 C129 U39
component class PSU_2V5: C130 C131 C132 C133 U40
component class PSU_3V3: C134 C135 C136 C137 U41
component class PSU_A3V3_ADC1: C142 C143 C144 U43
component class PSU_A3V3_ADC2: C181 C182 C183 U58
component class PSU_A3V3_CODEC: C145 C146 C147 U44
component class PSU: C1 C2 C3 C4 C87 J1 J2 J3 NT1 NT11 NT17 NT18 NT19 R111 TP1 TP2 TP3 TP4 TP5 TP6 TP7 TP8
component class PWM: F1
component class PWRPWM0: LED12 Q5 R123 R124 U22
component class PWRPWM1: LED8 Q1 R90 R91 U9
component class PWRPWM2: LED9 Q2 R92 R93 U10
component class PWRPWM3: LED10 Q3 R94 R95 U11
component class RS232: C148 C149 C150 C151 R209 R210 U59
component class RS485: C152 J26 R211 R212 U46
component class "RT CLOCK": C115 C116 D8 R147 R148 TP11 TP12 U27 Y3
component class SET_1V2: R207 R208
component class SET_1V8: R201 R202
component class SET_2V5: R203 R204
component class SET_3V3: R205 R206
component class Speakers: J34 J35
component class SW_DIP8_SMT: R236 R237 R238 R239 R240 R241 R242 R243 SW8
component class SYSBOOT: C160 C161 U51
component class TEST_RESET: R107 SW6
component class U_Audio_Codec: R98 R154 U45
component class FPGA_HOST: J24 R99 R153 R158 R159 R160 R264 R265 R266 U30
component class FPGA_USER: NT4 NT5 NT6 NT7 NT46 R68 R69 R70 R71 R72 R73 R74 R75 R76 R77 R78 R79 R80 R81 R155 R156 R157 R235 R277 R278 R283 U8
component class U_LED_01: C122 LED18 LED19 R170 R171 R172 R173 R174 R175 U32
component class U_LED_23: C123 LED20 LED21 R176 R177 R178 R179 R180 R181 U33
component class U_LED_45: C124 LED22 LED23 R182 R183 R184 R185 R186 R187 U34
component class U_LED_67: C125 LED24 LED25 R188 R189 R190 R191 R192 R193 U35
component class U_NB2_VIDEO_DAC: C96 C97 C98 C99 C100 L3 R116 R117 R118 R119 R120 R121 R122 U21
component class U_RELAY0: D3 LED11 Q4 R96 R97 RLY1
component class U_RELAY1: D4 LED13 Q6 R125 R126 RLY2
component class U_RELAY2: D5 LED14 Q7 R127 R128 RLY3
component class U_RELAY3: D6 LED15 Q8 R129 R130 RLY4
component class U_SRAM1: C71 C72 C73 C74 U14
component class U_SRAM2: C75 C76 C77 C78 U15
component class U_SRAM_HOST: C153 C154 C155 C156 U47
component class U_USB_CLK: C166 C167 C168 R244 U54 Y4
component class USB_USERHOST: C157 C169 C185 C186 C187 C336 C337 C338 C339 C340 C341 C342 F2 R257 R258 R259 R260 R261 R262 R263 R272 R273 R274 R275 R276 U61 U62 U63 U64 Y5
component class USER_DECOUPLING_CAPS_1V2: C184 C189 C190 C191 C192 C193 C194 C195 C196 C197 C198 C199
component class USER_DECOUPLING_CAPS_3V3: C200 C201 C202 C203 C215 C216 C217 C218 C219 C220 C221 C222 C223 C224 C225 C226 C227 C228 C229 C231 C232 C233 C234 C235 C236 C237 C238 C239 C240 C241 C242 C243 C244 C245 C246 C247 C248 C249 C250 C251 C252 C253 C254 C255 C256 C257 C258 C259
component class USER_FLASH: C162 C163 C164 C165 U52 U53
component class CON_LEDKBD: J28 NT26 NT27 NT28 NT29 NT30 NT31 NT33
component class USER_PROTOTYPE_AREA: PROTOTYPE1
component class VIDEO_OUT: U20
net class ADC#.ADC[3..0]: ADC#.ADC0 ADC#.ADC1 ADC#.ADC2 ADC#.ADC3
net class ADC#: ADC#.ADC0 ADC#.ADC1 ADC#.ADC2 ADC#.ADC3
net class ADC: ADC.CLK ADC.CS ADC.DIN ADC.DOUT
net class AIN: PB_AIN.L PB_AIN.MIC PB_AIN.R
net class AOUT: PB_AOUT.L PB_AOUT.R
net class ATE.DAC#.DAC[3..0]: ATE.DAC#.DAC0 ATE.DAC#.DAC1 ATE.DAC#.DAC2 ATE.DAC#.DAC3
net class ATE.PWM.OUT[3..0]: ATE.PWM.OUT0 ATE.PWM.OUT1 ATE.PWM.OUT2 ATE.PWM.OUT3
net class ATE.UIO.IO[35..0]: ATE.UIO.IO0 ATE.UIO.IO1 ATE.UIO.IO2 ATE.UIO.IO3 ATE.UIO.IO4 ATE.UIO.IO5 ATE.UIO.IO6 ATE.UIO.IO7 ATE.UIO.IO8 ATE.UIO.IO9 ATE.UIO.IO10 ATE.UIO.IO11 ATE.UIO.IO12 ATE.UIO.IO13 ATE.UIO.IO14 ATE.UIO.IO15 ATE.UIO.IO16 ATE.UIO.IO17 ATE.UIO.IO18 ATE.UIO.IO19 ATE.UIO.IO20 ATE.UIO.IO21 ATE.UIO.IO22 ATE.UIO.IO23 ATE.UIO.IO24 ATE.UIO.IO25 ATE.UIO.IO26 ATE.UIO.IO27 ATE.UIO.IO28 ATE.UIO.IO29 ATE.UIO.IO30 ATE.UIO.IO31 ATE.UIO.IO32 ATE.UIO.IO33 ATE.UIO.IO34 ATE.UIO.IO35
net class ATE: ADC#.ADC0 ADC#.ADC1 ADC#.ADC2 ADC#.ADC3 ATE.AUDIO.AMP_L ATE.AUDIO.AMP_R ATE.AUDIO.HP_L ATE.AUDIO.HP_R ATE.AUDIO.HP_SENSE ATE.AUDIO.LIN_L ATE.AUDIO.LIN_R ATE.AUDIO.LOUT_L ATE.AUDIO.LOUT_R ATE.DAC#.DAC0 ATE.DAC#.DAC1 ATE.DAC#.DAC2 ATE.DAC#.DAC3 ATE.HOST_ID.DATA ATE.HOST_ID.EXT_PROG ATE.HOST_JTAG.HARD.TCK ATE.HOST_JTAG.HARD.TDI ATE.HOST_JTAG.HARD.TDO ATE.HOST_JTAG.HARD.TMS ATE.HOST_JTAG.SOFT.TCK ATE.HOST_JTAG.SOFT.TDI ATE.HOST_JTAG.SOFT.TDO ATE.HOST_JTAG.SOFT.TMS ATE.KBD#.CLOCK ATE.KBD#.DATA ATE.MIDI#.MIDI_OUT_PWR ATE.MIDI#.MIDI_RX_N ATE.MIDI#.MIDI_RX_P ATE.MIDI#.MIDI_THRU_GND ATE.MIDI#.MIDI_THRU_PWR ATE.MIDI#.MIDI_THRU_TX ATE.MIDI#.MIDI_TX_GND ATE.MIDI#.MIDI_TX_N ATE.MSE#.CLOCK ATE.MSE#.DATA ATE.PWM.OUT0 ATE.PWM.OUT1 ATE.PWM.OUT2 ATE.PWM.OUT3 ATE.RS232#.CTS ATE.RS232#.DCD ATE.RS232#.RI ATE.RS232#.RTS ATE.RS232#.RXD ATE.RS232#.TXD ATE.RS485#.RX_N ATE.RS485#.RX_P ATE.RS485#.TX_N ATE.RS485#.TX_P ATE.SPDIF.IN ATE.SPDIF.OUT ATE.UIO.IO0 ATE.UIO.IO1 ATE.UIO.IO2 ATE.UIO.IO3 ATE.UIO.IO4 ATE.UIO.IO5 ATE.UIO.IO6 ATE.UIO.IO7 ATE.UIO.IO8 ATE.UIO.IO9 ATE.UIO.IO10 ATE.UIO.IO11 ATE.UIO.IO12 ATE.UIO.IO13 ATE.UIO.IO14 ATE.UIO.IO15 ATE.UIO.IO16 ATE.UIO.IO17 ATE.UIO.IO18 ATE.UIO.IO19 ATE.UIO.IO20 ATE.UIO.IO21 ATE.UIO.IO22 ATE.UIO.IO23 ATE.UIO.IO24 ATE.UIO.IO25 ATE.UIO.IO26 ATE.UIO.IO27 ATE.UIO.IO28 ATE.UIO.IO29 ATE.UIO.IO30 ATE.UIO.IO31 ATE.UIO.IO32 ATE.UIO.IO33 ATE.UIO.IO34 ATE.UIO.IO35 ATE.VGA#.BLUE ATE.VGA#.GREEN ATE.VGA#.HSYNC ATE.VGA#.ID0 ATE.VGA#.ID1/SDA/DDC ATE.VGA#.ID2 ATE.VGA#.ID3/SCL/DDC ATE.VGA#.KEY ATE.VGA#.RED ATE.VGA#.VSYNC
net class AUDIO: ATE.AUDIO.AMP_L ATE.AUDIO.AMP_R ATE.AUDIO.HP_L ATE.AUDIO.HP_R ATE.AUDIO.HP_SENSE ATE.AUDIO.LIN_L ATE.AUDIO.LIN_R ATE.AUDIO.LOUT_L ATE.AUDIO.LOUT_R
net class BOOT_FLASH: BOOT_FLASH.DIN BOOT_FLASH.DOUT BOOT_FLASH.FLASH_CS_N BOOT_FLASH.SCLK
net class CLOCKS: PBCTRL.CLK.CLK0 PBCTRL.CLK.CLK1 PBCTRL.CLK.CLK2 PBCTRL.CLK.EN
net class CM_FLASH: DB_MEM.BUS_A1 DB_MEM.BUS_A2 DB_MEM.BUS_A3 DB_MEM.BUS_A4 DB_MEM.BUS_A5 DB_MEM.BUS_A6 DB_MEM.BUS_A7 DB_MEM.BUS_A8 DB_MEM.BUS_A9 DB_MEM.BUS_A10 DB_MEM.BUS_A11 DB_MEM.BUS_A12 DB_MEM.BUS_A13 DB_MEM.BUS_A14 DB_MEM.BUS_A15 DB_MEM.BUS_A16 DB_MEM.BUS_A17 DB_MEM.BUS_A18 DB_MEM.BUS_A19 DB_MEM.BUS_A20 DB_MEM.BUS_A21 DB_MEM.BUS_A22 DB_MEM.BUS_A23 DB_MEM.BUS_A24 DB_MEM.BUS_D0 DB_MEM.BUS_D1 DB_MEM.BUS_D2 DB_MEM.BUS_D3 DB_MEM.BUS_D4 DB_MEM.BUS_D5 DB_MEM.BUS_D6 DB_MEM.BUS_D7 DB_MEM.BUS_D8 DB_MEM.BUS_D9 DB_MEM.BUS_D10 DB_MEM.BUS_D11 DB_MEM.BUS_D12 DB_MEM.BUS_D13 DB_MEM.BUS_D14 DB_MEM.BUS_D15 DB_MEM.BUS_FLASH_NBUSY DB_MEM.BUS_FLASH_NCS DB_MEM.BUS_FLASH_NRESET DB_MEM.BUS_NOE DB_MEM.BUS_NWE
net class CM_SDRAM: DB_MEM.BUS_A2 DB_MEM.BUS_A3 DB_MEM.BUS_A4 DB_MEM.BUS_A5 DB_MEM.BUS_A6 DB_MEM.BUS_A7 DB_MEM.BUS_A8 DB_MEM.BUS_A9 DB_MEM.BUS_A10 DB_MEM.BUS_A11 DB_MEM.BUS_A12 DB_MEM.BUS_A13 DB_MEM.BUS_A14 DB_MEM.BUS_A15 DB_MEM.BUS_A16 DB_MEM.BUS_D0 DB_MEM.BUS_D1 DB_MEM.BUS_D2 DB_MEM.BUS_D3 DB_MEM.BUS_D4 DB_MEM.BUS_D5 DB_MEM.BUS_D6 DB_MEM.BUS_D7 DB_MEM.BUS_D8 DB_MEM.BUS_D9 DB_MEM.BUS_D10 DB_MEM.BUS_D11 DB_MEM.BUS_D12 DB_MEM.BUS_D13 DB_MEM.BUS_D14 DB_MEM.BUS_D15 DB_MEM.BUS_D16 DB_MEM.BUS_D17 DB_MEM.BUS_D18 DB_MEM.BUS_D19 DB_MEM.BUS_D20 DB_MEM.BUS_D21 DB_MEM.BUS_D22 DB_MEM.BUS_D23 DB_MEM.BUS_D24 DB_MEM.BUS_D25 DB_MEM.BUS_D26 DB_MEM.BUS_D27 DB_MEM.BUS_D28 DB_MEM.BUS_D29 DB_MEM.BUS_D30 DB_MEM.BUS_D31 DB_MEM.BUS_NBE0 DB_MEM.BUS_NBE1 DB_MEM.BUS_NBE2 DB_MEM.BUS_NBE3 DB_MEM.BUS_NWE DB_MEM.BUS_SDRAM_CKE DB_MEM.BUS_SDRAM_CLK DB_MEM.BUS_SDRAM_NCAS DB_MEM.BUS_SDRAM_NCS DB_MEM.BUS_SDRAM_NRAS
net class CM_SRAM: DB_MEM.BUS_A2 DB_MEM.BUS_A3 DB_MEM.BUS_A4 DB_MEM.BUS_A5 DB_MEM.BUS_A6 DB_MEM.BUS_A7 DB_MEM.BUS_A8 DB_MEM.BUS_A9 DB_MEM.BUS_A10 DB_MEM.BUS_A11 DB_MEM.BUS_A12 DB_MEM.BUS_A13 DB_MEM.BUS_A14 DB_MEM.BUS_A15 DB_MEM.BUS_A16 DB_MEM.BUS_A17 DB_MEM.BUS_A18 DB_MEM.BUS_A19 DB_MEM.BUS_A20 DB_MEM.BUS_D0 DB_MEM.BUS_D1 DB_MEM.BUS_D2 DB_MEM.BUS_D3 DB_MEM.BUS_D4 DB_MEM.BUS_D5 DB_MEM.BUS_D6 DB_MEM.BUS_D7 DB_MEM.BUS_D8 DB_MEM.BUS_D9 DB_MEM.BUS_D10 DB_MEM.BUS_D11 DB_MEM.BUS_D12 DB_MEM.BUS_D13 DB_MEM.BUS_D14 DB_MEM.BUS_D15 DB_MEM.BUS_D16 DB_MEM.BUS_D17 DB_MEM.BUS_D18 DB_MEM.BUS_D19 DB_MEM.BUS_D20 DB_MEM.BUS_D21 DB_MEM.BUS_D22 DB_MEM.BUS_D23 DB_MEM.BUS_D24 DB_MEM.BUS_D25 DB_MEM.BUS_D26 DB_MEM.BUS_D27 DB_MEM.BUS_D28 DB_MEM.BUS_D29 DB_MEM.BUS_D30 DB_MEM.BUS_D31 DB_MEM.BUS_NBE0 DB_MEM.BUS_NBE1 DB_MEM.BUS_NBE2 DB_MEM.BUS_NBE3 DB_MEM.BUS_NOE DB_MEM.BUS_NWE DB_MEM.BUS_SRAM_NCS
net class CODEC: CODEC.I2S_BCLK CODEC.I2S_DIN CODEC.I2S_DOUT CODEC.I2S_MCLK CODEC.I2S_WCLK CODEC.SPI_CLK CODEC.SPI_CS_N CODEC.SPI_DIN CODEC.SPI_DOUT
net class DAC#: ATE.DAC#.DAC0 ATE.DAC#.DAC1 ATE.DAC#.DAC2 ATE.DAC#.DAC3
net class DAC: DAC.CLK DAC.CS DAC.DIN
net class DB_CLOCKS: DB_CLOCKS.FPGA_CLK DB_CLOCKS.FPGA_CLK1 DB_CLOCKS.REF_CLK
net class DB_JTAG: DB_JTAG.HARD.TCK DB_JTAG.HARD.TDI DB_JTAG.HARD.TDO DB_JTAG.HARD.TMS DB_JTAG.SOFT.TCK DB_JTAG.SOFT.TDI DB_JTAG.SOFT.TDO DB_JTAG.SOFT.TMS
net class DB_MEM.BUS_A[24..1]: DB_MEM.BUS_A1 DB_MEM.BUS_A2 DB_MEM.BUS_A3 DB_MEM.BUS_A4 DB_MEM.BUS_A5 DB_MEM.BUS_A6 DB_MEM.BUS_A7 DB_MEM.BUS_A8 DB_MEM.BUS_A9 DB_MEM.BUS_A10 DB_MEM.BUS_A11 DB_MEM.BUS_A12 DB_MEM.BUS_A13 DB_MEM.BUS_A14 DB_MEM.BUS_A15 DB_MEM.BUS_A16 DB_MEM.BUS_A17 DB_MEM.BUS_A18 DB_MEM.BUS_A19 DB_MEM.BUS_A20 DB_MEM.BUS_A21 DB_MEM.BUS_A22 DB_MEM.BUS_A23 DB_MEM.BUS_A24
net class DB_MEM.BUS_D[31..0]: DB_MEM.BUS_D0 DB_MEM.BUS_D1 DB_MEM.BUS_D2 DB_MEM.BUS_D3 DB_MEM.BUS_D4 DB_MEM.BUS_D5 DB_MEM.BUS_D6 DB_MEM.BUS_D7 DB_MEM.BUS_D8 DB_MEM.BUS_D9 DB_MEM.BUS_D10 DB_MEM.BUS_D11 DB_MEM.BUS_D12 DB_MEM.BUS_D13 DB_MEM.BUS_D14 DB_MEM.BUS_D15 DB_MEM.BUS_D16 DB_MEM.BUS_D17 DB_MEM.BUS_D18 DB_MEM.BUS_D19 DB_MEM.BUS_D20 DB_MEM.BUS_D21 DB_MEM.BUS_D22 DB_MEM.BUS_D23 DB_MEM.BUS_D24 DB_MEM.BUS_D25 DB_MEM.BUS_D26 DB_MEM.BUS_D27 DB_MEM.BUS_D28 DB_MEM.BUS_D29 DB_MEM.BUS_D30 DB_MEM.BUS_D31
net class DB_MEM.BUS_NBE[3..0]: DB_MEM.BUS_NBE0 DB_MEM.BUS_NBE1 DB_MEM.BUS_NBE2 DB_MEM.BUS_NBE3
net class DB_MEM: DB_MEM.BUS_A1 DB_MEM.BUS_A2 DB_MEM.BUS_A3 DB_MEM.BUS_A4 DB_MEM.BUS_A5 DB_MEM.BUS_A6 DB_MEM.BUS_A7 DB_MEM.BUS_A8 DB_MEM.BUS_A9 DB_MEM.BUS_A10 DB_MEM.BUS_A11 DB_MEM.BUS_A12 DB_MEM.BUS_A13 DB_MEM.BUS_A14 DB_MEM.BUS_A15 DB_MEM.BUS_A16 DB_MEM.BUS_A17 DB_MEM.BUS_A18 DB_MEM.BUS_A19 DB_MEM.BUS_A20 DB_MEM.BUS_A21 DB_MEM.BUS_A22 DB_MEM.BUS_A23 DB_MEM.BUS_A24 DB_MEM.BUS_D0 DB_MEM.BUS_D1 DB_MEM.BUS_D2 DB_MEM.BUS_D3 DB_MEM.BUS_D4 DB_MEM.BUS_D5 DB_MEM.BUS_D6 DB_MEM.BUS_D7 DB_MEM.BUS_D8 DB_MEM.BUS_D9 DB_MEM.BUS_D10 DB_MEM.BUS_D11 DB_MEM.BUS_D12 DB_MEM.BUS_D13 DB_MEM.BUS_D14 DB_MEM.BUS_D15 DB_MEM.BUS_D16 DB_MEM.BUS_D17 DB_MEM.BUS_D18 DB_MEM.BUS_D19 DB_MEM.BUS_D20 DB_MEM.BUS_D21 DB_MEM.BUS_D22 DB_MEM.BUS_D23 DB_MEM.BUS_D24 DB_MEM.BUS_D25 DB_MEM.BUS_D26 DB_MEM.BUS_D27 DB_MEM.BUS_D28 DB_MEM.BUS_D29 DB_MEM.BUS_D30 DB_MEM.BUS_D31 DB_MEM.BUS_FLASH_NBUSY DB_MEM.BUS_FLASH_NCS DB_MEM.BUS_FLASH_NRESET DB_MEM.BUS_NBE0 DB_MEM.BUS_NBE1 DB_MEM.BUS_NBE2 DB_MEM.BUS_NBE3 DB_MEM.BUS_NOE DB_MEM.BUS_NWE DB_MEM.BUS_SDRAM_CKE DB_MEM.BUS_SDRAM_CLK DB_MEM.BUS_SDRAM_NCAS DB_MEM.BUS_SDRAM_NCS DB_MEM.BUS_SDRAM_NRAS DB_MEM.BUS_SRAM_NCS
net class DB_PROGRAM.ID[3..0]: DB_PROGRAM.ID0 DB_PROGRAM.ID1 DB_PROGRAM.ID2 DB_PROGRAM.ID3
net class DB_PROGRAM.M[2..0]: DB_PROGRAM.M0 DB_PROGRAM.M1 DB_PROGRAM.M2
net class DB_PROGRAM: DB_PROGRAM.CCLK DB_PROGRAM.DIN DB_PROGRAM.DONE DB_PROGRAM.ID0 DB_PROGRAM.ID1 DB_PROGRAM.ID2 DB_PROGRAM.ID3 DB_PROGRAM.INIT DB_PROGRAM.INSTALLED DB_PROGRAM.M0 DB_PROGRAM.M1 DB_PROGRAM.M2 DB_PROGRAM.PROG_CLK DB_PROGRAM.PROG_PWR_ON DB_PROGRAM.PROGRAM
net class DB_SPI: DB_SPI.CLK DB_SPI.DIN DB_SPI.DOUT DB_SPI.MODE DB_SPI.SEL
net class DB_SRAM1.A[18..0]: DB_SRAM1.A0 DB_SRAM1.A1 DB_SRAM1.A2 DB_SRAM1.A3 DB_SRAM1.A4 DB_SRAM1.A5 DB_SRAM1.A6 DB_SRAM1.A7 DB_SRAM1.A8 DB_SRAM1.A9 DB_SRAM1.A10 DB_SRAM1.A11 DB_SRAM1.A12 DB_SRAM1.A13 DB_SRAM1.A14 DB_SRAM1.A15 DB_SRAM1.A16 DB_SRAM1.A17 DB_SRAM1.A18
net class DB_SRAM1.D[15..0]: DB_SRAM1.D0 DB_SRAM1.D1 DB_SRAM1.D2 DB_SRAM1.D3 DB_SRAM1.D4 DB_SRAM1.D5 DB_SRAM1.D6 DB_SRAM1.D7 DB_SRAM1.D8 DB_SRAM1.D9 DB_SRAM1.D10 DB_SRAM1.D11 DB_SRAM1.D12 DB_SRAM1.D13 DB_SRAM1.D14 DB_SRAM1.D15
net class DB_SRAM1: DB_SRAM1.A0 DB_SRAM1.A1 DB_SRAM1.A2 DB_SRAM1.A3 DB_SRAM1.A4 DB_SRAM1.A5 DB_SRAM1.A6 DB_SRAM1.A7 DB_SRAM1.A8 DB_SRAM1.A9 DB_SRAM1.A10 DB_SRAM1.A11 DB_SRAM1.A12 DB_SRAM1.A13 DB_SRAM1.A14 DB_SRAM1.A15 DB_SRAM1.A16 DB_SRAM1.A17 DB_SRAM1.A18 DB_SRAM1.D0 DB_SRAM1.D1 DB_SRAM1.D2 DB_SRAM1.D3 DB_SRAM1.D4 DB_SRAM1.D5 DB_SRAM1.D6 DB_SRAM1.D7 DB_SRAM1.D8 DB_SRAM1.D9 DB_SRAM1.D10 DB_SRAM1.D11 DB_SRAM1.D12 DB_SRAM1.D13 DB_SRAM1.D14 DB_SRAM1.D15 DB_SRAM1.NBHE DB_SRAM1.NBLE DB_SRAM1.NCS DB_SRAM1.NOE DB_SRAM1.NWE
net class DB_SRAM2.A[18..0]: DB_SRAM2.A0 DB_SRAM2.A1 DB_SRAM2.A2 DB_SRAM2.A3 DB_SRAM2.A4 DB_SRAM2.A5 DB_SRAM2.A6 DB_SRAM2.A7 DB_SRAM2.A8 DB_SRAM2.A9 DB_SRAM2.A10 DB_SRAM2.A11 DB_SRAM2.A12 DB_SRAM2.A13 DB_SRAM2.A14 DB_SRAM2.A15 DB_SRAM2.A16 DB_SRAM2.A17 DB_SRAM2.A18
net class DB_SRAM2.D[15..0]: DB_SRAM2.D0 DB_SRAM2.D1 DB_SRAM2.D2 DB_SRAM2.D3 DB_SRAM2.D4 DB_SRAM2.D5 DB_SRAM2.D6 DB_SRAM2.D7 DB_SRAM2.D8 DB_SRAM2.D9 DB_SRAM2.D10 DB_SRAM2.D11 DB_SRAM2.D12 DB_SRAM2.D13 DB_SRAM2.D14 DB_SRAM2.D15
net class DB_SRAM2: DB_SRAM2.A0 DB_SRAM2.A1 DB_SRAM2.A2 DB_SRAM2.A3 DB_SRAM2.A4 DB_SRAM2.A5 DB_SRAM2.A6 DB_SRAM2.A7 DB_SRAM2.A8 DB_SRAM2.A9 DB_SRAM2.A10 DB_SRAM2.A11 DB_SRAM2.A12 DB_SRAM2.A13 DB_SRAM2.A14 DB_SRAM2.A15 DB_SRAM2.A16 DB_SRAM2.A17 DB_SRAM2.A18 DB_SRAM2.D0 DB_SRAM2.D1 DB_SRAM2.D2 DB_SRAM2.D3 DB_SRAM2.D4 DB_SRAM2.D5 DB_SRAM2.D6 DB_SRAM2.D7 DB_SRAM2.D8 DB_SRAM2.D9 DB_SRAM2.D10 DB_SRAM2.D11 DB_SRAM2.D12 DB_SRAM2.D13 DB_SRAM2.D14 DB_SRAM2.D15 DB_SRAM2.NBHE DB_SRAM2.NBLE DB_SRAM2.NCS DB_SRAM2.NOE DB_SRAM2.NWE
net class DBSD.DAT[3..0]: DBSD.DAT0 DBSD.DAT1 DBSD.DAT2 DBSD.DAT3
net class DBSD: DBSD.CLK DBSD.CMD DBSD.DAT0 DBSD.DAT1 DBSD.DAT2 DBSD.DAT3 DBSD.DETECT DBSD.PROTECT
net class DBUSB#: DBUSB#.DMINUS DBUSB#.DPLUS DBUSB#.VBUS
net class DBUSB.D[15..0]: DBUSB.D0 DBUSB.D1 DBUSB.D2 DBUSB.D3 DBUSB.D4 DBUSB.D5 DBUSB.D6 DBUSB.D7 DBUSB.D8 DBUSB.D9 DBUSB.D10 DBUSB.D11 DBUSB.D12 DBUSB.D13 DBUSB.D14 DBUSB.D15
net class DBUSB: DBUSB.D0 DBUSB.D1 DBUSB.D2 DBUSB.D3 DBUSB.D4 DBUSB.D5 DBUSB.D6 DBUSB.D7 DBUSB.D8 DBUSB.D9 DBUSB.D10 DBUSB.D11 DBUSB.D12 DBUSB.D13 DBUSB.D14 DBUSB.D15 DBUSB.FIFOADR0 DBUSB.FIFOADR1 DBUSB.FIFOADR2 DBUSB.FLAGA DBUSB.FLAGB DBUSB.FLAGC DBUSB.FLAGD_CS_N DBUSB.IFCLK DBUSB.INT_N DBUSB.PKTEND DBUSB.RD_N DBUSB.READY DBUSB.RESET_N DBUSB.SLOE DBUSB.VBUS DBUSB.WR_N DBUSB.XTALIN DBUSB.XTALOUT
net class DIAGCOMMS: DIAGCOMMS.DIN DIAGCOMMS.DOUT DIAGCOMMS.FLASH_CS_N DIAGCOMMS.SCLK
net class DIPSW.D[7..0]: DIPSW.D0 DIPSW.D1 DIPSW.D2 DIPSW.D3 DIPSW.D4 DIPSW.D5 DIPSW.D6 DIPSW.D7
net class DIPSW: DIPSW.D0 DIPSW.D1 DIPSW.D2 DIPSW.D3 DIPSW.D4 DIPSW.D5 DIPSW.D6 DIPSW.D7
net class ETH#: ETH#.ACT_A ETH#.LINK_K ETH#.RX_CT ETH#.RX_N ETH#.RX_P ETH#.TX_N ETH#.TX_P
net class ETH.E_RXD[3..0]: ETH.E_RXD0 ETH.E_RXD1 ETH.E_RXD2 ETH.E_RXD3
net class ETH.E_TXD[3..0]: ETH.E_TXD0 ETH.E_TXD1 ETH.E_TXD2 ETH.E_TXD3
net class "Ethernet Interface": ETH.E_COL ETH.E_CRS ETH.E_MDC ETH.E_MDIO ETH.E_RESETB_E ETH.E_RXC ETH.E_RXD0 ETH.E_RXD1 ETH.E_RXD2 ETH.E_RXD3 ETH.E_RXDV ETH.E_RXER ETH.E_TXC ETH.E_TXD0 ETH.E_TXD1 ETH.E_TXD2 ETH.E_TXD3 ETH.E_TXEN
net class ETH: ETH.E_COL ETH.E_CRS ETH.E_MDC ETH.E_MDIO ETH.E_RESETB_E ETH.E_RXC ETH.E_RXD0 ETH.E_RXD1 ETH.E_RXD2 ETH.E_RXD3 ETH.E_RXDV ETH.E_RXER ETH.E_TXC ETH.E_TXD0 ETH.E_TXD1 ETH.E_TXD2 ETH.E_TXD3 ETH.E_TXEN
net class GOLD_FLASH: GOLD_FLASH.DIN GOLD_FLASH.DOUT GOLD_FLASH.FLASH_CS_N GOLD_FLASH.SCLK
net class HOST_AUDIO: HOST_AUDIO.L HOST_AUDIO.R
net class HOST_CLK: DB_CLOCKS.FPGA_CLK DB_CLOCKS.REF_CLK HOST_CLK.CS_N HOST_CLK.DIN HOST_CLK.SCLK
net class HOST_ID: ATE.HOST_ID.DATA ATE.HOST_ID.EXT_PROG
net class HOST_JTAG: ATE.HOST_JTAG.HARD.TCK ATE.HOST_JTAG.HARD.TDI ATE.HOST_JTAG.HARD.TDO ATE.HOST_JTAG.HARD.TMS ATE.HOST_JTAG.SOFT.TCK ATE.HOST_JTAG.SOFT.TDI ATE.HOST_JTAG.SOFT.TDO ATE.HOST_JTAG.SOFT.TMS
net class HOST_LED1: HOST_LED1.BLUE HOST_LED1.GREEN HOST_LED1.RED
net class HOST_LED2: HOST_LED2.BLUE HOST_LED2.GREEN HOST_LED2.RED
net class HOST_RTC: HOST_RTC.CLKOE HOST_RTC.CLKOUT HOST_RTC.CS_N HOST_RTC.DIN HOST_RTC.DOUT HOST_RTC.INT_N HOST_RTC.SCLK
net class HOST_SD.DAT[3..0]: HOST_SD.DAT0 HOST_SD.DAT1 HOST_SD.DAT2 HOST_SD.DAT3
net class HOST_SD: HOST_SD.CLK HOST_SD.CMD HOST_SD.DAT0 HOST_SD.DAT1 HOST_SD.DAT2 HOST_SD.DAT3 HOST_SD.DETECT HOST_SD.PROTECT
net class HOST_SRAM.A[18..0]: HOST_SRAM.A0 HOST_SRAM.A1 HOST_SRAM.A2 HOST_SRAM.A3 HOST_SRAM.A4 HOST_SRAM.A5 HOST_SRAM.A6 HOST_SRAM.A7 HOST_SRAM.A8 HOST_SRAM.A9 HOST_SRAM.A10 HOST_SRAM.A11 HOST_SRAM.A12 HOST_SRAM.A13 HOST_SRAM.A14 HOST_SRAM.A15 HOST_SRAM.A16 HOST_SRAM.A17 HOST_SRAM.A18
net class HOST_SRAM.D[15..0]: HOST_SRAM.D0 HOST_SRAM.D1 HOST_SRAM.D2 HOST_SRAM.D3 HOST_SRAM.D4 HOST_SRAM.D5 HOST_SRAM.D6 HOST_SRAM.D7 HOST_SRAM.D8 HOST_SRAM.D9 HOST_SRAM.D10 HOST_SRAM.D11 HOST_SRAM.D12 HOST_SRAM.D13 HOST_SRAM.D14 HOST_SRAM.D15
net class HOST_SRAM: HOST_SRAM.A0 HOST_SRAM.A1 HOST_SRAM.A2 HOST_SRAM.A3 HOST_SRAM.A4 HOST_SRAM.A5 HOST_SRAM.A6 HOST_SRAM.A7 HOST_SRAM.A8 HOST_SRAM.A9 HOST_SRAM.A10 HOST_SRAM.A11 HOST_SRAM.A12 HOST_SRAM.A13 HOST_SRAM.A14 HOST_SRAM.A15 HOST_SRAM.A16 HOST_SRAM.A17 HOST_SRAM.A18 HOST_SRAM.D0 HOST_SRAM.D1 HOST_SRAM.D2 HOST_SRAM.D3 HOST_SRAM.D4 HOST_SRAM.D5 HOST_SRAM.D6 HOST_SRAM.D7 HOST_SRAM.D8 HOST_SRAM.D9 HOST_SRAM.D10 HOST_SRAM.D11 HOST_SRAM.D12 HOST_SRAM.D13 HOST_SRAM.D14 HOST_SRAM.D15 HOST_SRAM.NBHE HOST_SRAM.NBLE HOST_SRAM.NCS HOST_SRAM.NOE HOST_SRAM.NWE
net class HOST_USB.D[15..0]: HOST_USB.D0 HOST_USB.D1 HOST_USB.D2 HOST_USB.D3 HOST_USB.D4 HOST_USB.D5 HOST_USB.D6 HOST_USB.D7 HOST_USB.D8 HOST_USB.D9 HOST_USB.D10 HOST_USB.D11 HOST_USB.D12 HOST_USB.D13 HOST_USB.D14 HOST_USB.D15
net class HOST_USB: HOST_USB.D0 HOST_USB.D1 HOST_USB.D2 HOST_USB.D3 HOST_USB.D4 HOST_USB.D5 HOST_USB.D6 HOST_USB.D7 HOST_USB.D8 HOST_USB.D9 HOST_USB.D10 HOST_USB.D11 HOST_USB.D12 HOST_USB.D13 HOST_USB.D14 HOST_USB.D15 HOST_USB.FIFOADR0 HOST_USB.FIFOADR1 HOST_USB.FIFOADR2 HOST_USB.FLAGA HOST_USB.FLAGB HOST_USB.FLAGC HOST_USB.FLAGD_CS_N HOST_USB.IFCLK HOST_USB.INT_N HOST_USB.PKTEND HOST_USB.RD_N HOST_USB.READY HOST_USB.RESET_N HOST_USB.SLOE HOST_USB.VBUS HOST_USB.WR_N HOST_USB.XTALIN HOST_USB.XTALOUT
net class HOSTUSB#: HOSTUSB#.DMINUS HOSTUSB#.DPLUS HOSTUSB#.VBUS
net class I2C: I2C.SCL I2C.SDA
net class ISP176X: DB_MEM.BUS_A1 DB_MEM.BUS_A2 DB_MEM.BUS_A3 DB_MEM.BUS_A4 DB_MEM.BUS_A5 DB_MEM.BUS_A6 DB_MEM.BUS_A7 DB_MEM.BUS_A8 DB_MEM.BUS_A9 DB_MEM.BUS_A10 DB_MEM.BUS_A11 DB_MEM.BUS_A12 DB_MEM.BUS_A13 DB_MEM.BUS_A14 DB_MEM.BUS_A15 DB_MEM.BUS_A16 DB_MEM.BUS_A17 DB_MEM.BUS_D0 DB_MEM.BUS_D1 DB_MEM.BUS_D2 DB_MEM.BUS_D3 DB_MEM.BUS_D4 DB_MEM.BUS_D5 DB_MEM.BUS_D6 DB_MEM.BUS_D7 DB_MEM.BUS_D8 DB_MEM.BUS_D9 DB_MEM.BUS_D10 DB_MEM.BUS_D11 DB_MEM.BUS_D12 DB_MEM.BUS_D13 DB_MEM.BUS_D14 DB_MEM.BUS_D15 DB_MEM.BUS_D16 DB_MEM.BUS_D17 DB_MEM.BUS_D18 DB_MEM.BUS_D19 DB_MEM.BUS_D20 DB_MEM.BUS_D21 DB_MEM.BUS_D22 DB_MEM.BUS_D23 DB_MEM.BUS_D24 DB_MEM.BUS_D25 DB_MEM.BUS_D26 DB_MEM.BUS_D27 DB_MEM.BUS_D28 DB_MEM.BUS_D29 DB_MEM.BUS_D30 DB_MEM.BUS_D31 DB_MEM.BUS_NOE DB_MEM.BUS_NWE ISP176X.BUS_DMA_ACK ISP176X.BUS_DMA_REQ ISP176X.BUS_NCS ISP176X.BUS_NIRQ ISP176X.ISP176X_NRESET
net class JTAG: JTAG.DETECT JTAG.HARD.TCK JTAG.HARD.TDI JTAG.HARD.TDO JTAG.HARD.TMS JTAG.SOFT.TCK JTAG.SOFT.TDI JTAG.SOFT.TDO JTAG.SOFT.TMS
net class KBD#: ATE.KBD#.CLOCK ATE.KBD#.DATA
net class KEYBOARD: KEYBOARD.CLOCK KEYBOARD.DATA
net class LEDS#: LEDS#.LED0.BLUE LEDS#.LED0.GREEN LEDS#.LED0.RED LEDS#.LED1.BLUE LEDS#.LED1.GREEN LEDS#.LED1.RED LEDS#.LED2.BLUE LEDS#.LED2.GREEN LEDS#.LED2.RED LEDS#.LED3.BLUE LEDS#.LED3.GREEN LEDS#.LED3.RED LEDS#.LED4.BLUE LEDS#.LED4.GREEN LEDS#.LED4.RED LEDS#.LED5.BLUE LEDS#.LED5.GREEN LEDS#.LED5.RED LEDS#.LED6.BLUE LEDS#.LED6.GREEN LEDS#.LED6.RED LEDS#.LED7.BLUE LEDS#.LED7.GREEN LEDS#.LED7.RED NetJ28_7 NetJ28_14 NetJ28_24 NetJ28_26 NetJ28_29 NetJ28_31 NetJ28_33
net class MIDI#: ATE.MIDI#.MIDI_OUT_PWR ATE.MIDI#.MIDI_RX_N ATE.MIDI#.MIDI_RX_P ATE.MIDI#.MIDI_THRU_GND ATE.MIDI#.MIDI_THRU_PWR ATE.MIDI#.MIDI_THRU_TX ATE.MIDI#.MIDI_TX_GND ATE.MIDI#.MIDI_TX_N
net class MIDI: MIDI.MIDI_RX MIDI.MIDI_TX
net class MOUSE: MOUSE.CLOCK MOUSE.DATA
net class MSE#: ATE.MSE#.CLOCK ATE.MSE#.DATA
net class ONE_WIRE: PBCTRL.1W.ID PBCTRL.1W.PIO1 PBCTRL.1W.PIO2
net class PB_AIN: PB_AIN.L PB_AIN.MIC PB_AIN.R
net class PB_AOUT: PB_AOUT.L PB_AOUT.R
net class PB_SPI: PB_SPI.DIN PB_SPI.DOUT PB_SPI.SCLK
net class PBCTRL.1W.PIO[1..2]: PBCTRL.1W.PIO1 PBCTRL.1W.PIO2
net class PBCTRL.CLK.CLK[2..0]: PBCTRL.CLK.CLK0 PBCTRL.CLK.CLK1 PBCTRL.CLK.CLK2
net class PBCTRL.SPARE[1..4]: PBCTRL.SPARE1 PBCTRL.SPARE2 PBCTRL.SPARE3 PBCTRL.SPARE4
net class PBCTRL.SPI_CS_N[1..0]: PBCTRL.SPI_CS_N0 PBCTRL.SPI_CS_N1
net class PBCTRL: PBCTRL.1W.ID PBCTRL.1W.PIO1 PBCTRL.1W.PIO2 PBCTRL.CLK.CLK0 PBCTRL.CLK.CLK1 PBCTRL.CLK.CLK2 PBCTRL.CLK.EN PBCTRL.JTAG.DETECT PBCTRL.JTAG.HARD.TCK PBCTRL.JTAG.HARD.TDI PBCTRL.JTAG.HARD.TDO PBCTRL.JTAG.HARD.TMS PBCTRL.JTAG.SOFT.TCK PBCTRL.JTAG.SOFT.TDI PBCTRL.JTAG.SOFT.TDO PBCTRL.JTAG.SOFT.TMS PBCTRL.SPARE1 PBCTRL.SPARE2 PBCTRL.SPARE3 PBCTRL.SPARE4 PBCTRL.SPI_CS_N0 PBCTRL.SPI_CS_N1
net class PBIO.D[49..0]: PBIO.D0 PBIO.D1 PBIO.D2 PBIO.D3 PBIO.D4 PBIO.D5 PBIO.D6 PBIO.D7 PBIO.D8 PBIO.D9 PBIO.D10 PBIO.D11 PBIO.D12 PBIO.D13 PBIO.D14 PBIO.D15 PBIO.D16 PBIO.D17 PBIO.D18 PBIO.D19 PBIO.D20 PBIO.D21 PBIO.D22 PBIO.D23 PBIO.D24 PBIO.D25 PBIO.D26 PBIO.D27 PBIO.D28 PBIO.D29 PBIO.D30 PBIO.D31 PBIO.D32 PBIO.D33 PBIO.D34 PBIO.D35 PBIO.D36 PBIO.D37 PBIO.D38 PBIO.D39 PBIO.D40 PBIO.D41 PBIO.D42 PBIO.D43 PBIO.D44 PBIO.D45 PBIO.D46 PBIO.D47 PBIO.D48 PBIO.D49
net class PBIO: PBIO.D0 PBIO.D1 PBIO.D2 PBIO.D3 PBIO.D4 PBIO.D5 PBIO.D6 PBIO.D7 PBIO.D8 PBIO.D9 PBIO.D10 PBIO.D11 PBIO.D12 PBIO.D13 PBIO.D14 PBIO.D15 PBIO.D16 PBIO.D17 PBIO.D18 PBIO.D19 PBIO.D20 PBIO.D21 PBIO.D22 PBIO.D23 PBIO.D24 PBIO.D25 PBIO.D26 PBIO.D27 PBIO.D28 PBIO.D29 PBIO.D30 PBIO.D31 PBIO.D32 PBIO.D33 PBIO.D34 PBIO.D35 PBIO.D36 PBIO.D37 PBIO.D38 PBIO.D39 PBIO.D40 PBIO.D41 PBIO.D42 PBIO.D43 PBIO.D44 PBIO.D45 PBIO.D46 PBIO.D47 PBIO.D48 PBIO.D49
net class PORT1: PORT1.DMINUS PORT1.DPLUS PORT1.VBUS
net class PORT2: PORT1.VBUS PORT2.DMINUS PORT2.DPLUS
net class PORT3: PORT1.VBUS PORT3.DMINUS PORT3.DPLUS
net class PROTOTYPE: ATE.UIO.IO0 ATE.UIO.IO1 ATE.UIO.IO2 ATE.UIO.IO3 ATE.UIO.IO4 ATE.UIO.IO5 ATE.UIO.IO6 ATE.UIO.IO7 ATE.UIO.IO8 ATE.UIO.IO9 ATE.UIO.IO10 ATE.UIO.IO11 ATE.UIO.IO12 ATE.UIO.IO13 ATE.UIO.IO14 ATE.UIO.IO15 ATE.UIO.IO16 ATE.UIO.IO17 ATE.UIO.IO18 ATE.UIO.IO19 ATE.UIO.IO20 ATE.UIO.IO21 ATE.UIO.IO22 ATE.UIO.IO23 ATE.UIO.IO24 ATE.UIO.IO25 ATE.UIO.IO26 ATE.UIO.IO27 ATE.UIO.IO28 ATE.UIO.IO29 ATE.UIO.IO30 ATE.UIO.IO31 ATE.UIO.IO32 ATE.UIO.IO33 ATE.UIO.IO34 ATE.UIO.IO35
net class PWM#: ATE.PWM.OUT0 ATE.PWM.OUT1 ATE.PWM.OUT2 ATE.PWM.OUT3
net class PWM: PWM.PWM0 PWM.PWM1 PWM.PWM2 PWM.PWM3
net class PWRNET: 5V0 AUGND GND
net class RELAY.RELAY[3..0]: RELAY.RELAY0 RELAY.RELAY1 RELAY.RELAY2 RELAY.RELAY3
net class RELAYS#: RELAYS#.C0 RELAYS#.C1 RELAYS#.C2 RELAYS#.C3 RELAYS#.NC0 RELAYS#.NC1 RELAYS#.NC2 RELAYS#.NC3 RELAYS#.NO0 RELAYS#.NO1 RELAYS#.NO2 RELAYS#.NO3
net class RELAY: RELAY.RELAY0 RELAY.RELAY1 RELAY.RELAY2 RELAY.RELAY3
net class RS232#: ATE.RS232#.CTS ATE.RS232#.DCD ATE.RS232#.RI ATE.RS232#.RTS ATE.RS232#.RXD ATE.RS232#.TXD
net class RS232: RS232.CTS RS232.RTS RS232.RXD RS232.TXD
net class RS485#: ATE.RS485#.RX_N ATE.RS485#.RX_P ATE.RS485#.TX_N ATE.RS485#.TX_P
net class RS485: RS485.RX_EN RS485.RXD RS485.TX_EN RS485.TXD
net class S_LED[4..0]: S_LED0 S_LED1 S_LED2 S_LED3 S_LED4
net class SPAREIO: SPAREIO.1 SPAREIO.2 SPAREIO.3 SPAREIO.4
net class SPDIF: ATE.SPDIF.IN ATE.SPDIF.OUT
net class SPI: PB_SPI.DIN PB_SPI.DOUT PB_SPI.SCLK
net class SPK_L: SPK_L.SPK+ SPK_L.SPK-
net class SPK_R: SPK_R.SPK+ SPK_R.SPK-
net class SW#.D[4..0]: SW#.D0 SW#.D1 SW#.D2 SW#.D3 SW#.D4
net class SW#: SW#.D0 SW#.D1 SW#.D2 SW#.D3 SW#.D4
net class SW: SW#.D0 SW#.D1 SW#.D2 SW#.D3 SW#.D4
net class TFT_IO.DB[17..0]: TFT_IO.DB0 TFT_IO.DB1 TFT_IO.DB2 TFT_IO.DB3 TFT_IO.DB4 TFT_IO.DB5 TFT_IO.DB6 TFT_IO.DB7 TFT_IO.DB8 TFT_IO.DB9 TFT_IO.DB10 TFT_IO.DB11 TFT_IO.DB12 TFT_IO.DB13 TFT_IO.DB14 TFT_IO.DB15 TFT_IO.DB16 TFT_IO.DB17
net class TFT_IO: TFT_IO.BL TFT_IO.CS TFT_IO.DB0 TFT_IO.DB1 TFT_IO.DB2 TFT_IO.DB3 TFT_IO.DB4 TFT_IO.DB5 TFT_IO.DB6 TFT_IO.DB7 TFT_IO.DB8 TFT_IO.DB9 TFT_IO.DB10 TFT_IO.DB11 TFT_IO.DB12 TFT_IO.DB13 TFT_IO.DB14 TFT_IO.DB15 TFT_IO.DB16 TFT_IO.DB17 TFT_IO.IR38KRX TFT_IO.IR38KTX TFT_IO.RD TFT_IO.RESET TFT_IO.RS TFT_IO.WR TFT_TSC.TFT_INT
net class TFT_TSC: TFT_TSC.BUSY TFT_TSC.CLK TFT_TSC.CS_N TFT_TSC.DIN TFT_TSC.DOUT
net class UIO_PWR: UIO_PWR.AIN UIO_PWR.BIN
net class UIO: ATE.UIO.IO0 ATE.UIO.IO1 ATE.UIO.IO2 ATE.UIO.IO3 ATE.UIO.IO4 ATE.UIO.IO5 ATE.UIO.IO6 ATE.UIO.IO7 ATE.UIO.IO8 ATE.UIO.IO9 ATE.UIO.IO10 ATE.UIO.IO11 ATE.UIO.IO12 ATE.UIO.IO13 ATE.UIO.IO14 ATE.UIO.IO15 ATE.UIO.IO16 ATE.UIO.IO17 ATE.UIO.IO18 ATE.UIO.IO19 ATE.UIO.IO20 ATE.UIO.IO21 ATE.UIO.IO22 ATE.UIO.IO23 ATE.UIO.IO24 ATE.UIO.IO25 ATE.UIO.IO26 ATE.UIO.IO27 ATE.UIO.IO28 ATE.UIO.IO29 ATE.UIO.IO30 ATE.UIO.IO31 ATE.UIO.IO32 ATE.UIO.IO33 ATE.UIO.IO34 ATE.UIO.IO35
net class USER_FLASH: USER_FLASH.DIN USER_FLASH.DOUT USER_FLASH.FLASH1_CS_N USER_FLASH.FLASH2_CS_N USER_FLASH.SCLK
net class USER_LEDS: USER_LEDS.LED0.BLUE USER_LEDS.LED0.GREEN USER_LEDS.LED0.RED USER_LEDS.LED1.BLUE USER_LEDS.LED1.GREEN USER_LEDS.LED1.RED USER_LEDS.LED2.BLUE USER_LEDS.LED2.GREEN USER_LEDS.LED2.RED USER_LEDS.LED3.BLUE USER_LEDS.LED3.GREEN USER_LEDS.LED3.RED USER_LEDS.LED4.BLUE USER_LEDS.LED4.GREEN USER_LEDS.LED4.RED USER_LEDS.LED5.BLUE USER_LEDS.LED5.GREEN USER_LEDS.LED5.RED USER_LEDS.LED6.BLUE USER_LEDS.LED6.GREEN USER_LEDS.LED6.RED USER_LEDS.LED7.BLUE USER_LEDS.LED7.GREEN USER_LEDS.LED7.RED
net class VGA#: ATE.VGA#.BLUE ATE.VGA#.GREEN ATE.VGA#.HSYNC ATE.VGA#.ID0 ATE.VGA#.ID1/SDA/DDC ATE.VGA#.ID2 ATE.VGA#.ID3/SCL/DDC ATE.VGA#.KEY ATE.VGA#.RED ATE.VGA#.VSYNC
net class VGA.BLUE[7..0]: VGA.BLUE0 VGA.BLUE1 VGA.BLUE2 VGA.BLUE3 VGA.BLUE4 VGA.BLUE5 VGA.BLUE6 VGA.BLUE7
net class VGA.GREEN[7..0]: VGA.GREEN0 VGA.GREEN1 VGA.GREEN2 VGA.GREEN3 VGA.GREEN4 VGA.GREEN5 VGA.GREEN6 VGA.GREEN7
net class VGA.RED[7..0]: VGA.RED0 VGA.RED1 VGA.RED2 VGA.RED3 VGA.RED4 VGA.RED5 VGA.RED6 VGA.RED7
net class VGA: ATE.VGA#.HSYNC ATE.VGA#.VSYNC VGA.BLUE0 VGA.BLUE1 VGA.BLUE2 VGA.BLUE3 VGA.BLUE4 VGA.BLUE5 VGA.BLUE6 VGA.BLUE7 VGA.GREEN0 VGA.GREEN1 VGA.GREEN2 VGA.GREEN3 VGA.GREEN4 VGA.GREEN5 VGA.GREEN6 VGA.GREEN7 VGA.RED0 VGA.RED1 VGA.RED2 VGA.RED3 VGA.RED4 VGA.RED5 VGA.RED6 VGA.RED7 VGA.VGA_CLK
net class TFT_TOUCH: TFT_TOUCH.X+ TFT_TOUCH.X- TFT_TOUCH.Y+ TFT_TOUCH.Y-
component class LCDTFT: NT42 NT43 NT44 R215 U48

## Components (designator, comment, footprint, x,y, rotation, side; value= is the part's Value field where it differs from the comment)
"Altium Logo BOT1" "Altium(2009)" LOGO-ALTIUM-NEW 4035,4446.45 r180 bottom locked
BT1 "CELLBATT 20mm HEADER" CELL_HOLDER 4215,4705 r180 top locked
C1 "220uF 10V" CAPC7343-STAR -160,5585 r270 top locked
C2 "220uF 10V" CAPC7343-STAR -160,2040 r270 top locked
C3 "10uF 20V" CAPC3528-STAR#1 -355,4080 r180 top locked
C4 "10uF 20V" CAPC3528-STAR#1 -50,1595 r180 top locked
C5 "1uF 10V" CAPC1005-STAR#1 1374.99,950 r180 bottom locked (schematic designator C13)
C6 "1uF 10V" CAPC1005-STAR#1 1175,950 r180 bottom locked (schematic designator C14)
C7 "4.7nF 10V" CAPC1005-STAR#1 -200,3906.82 r180 bottom locked (schematic designator C11)
C8 "1uF 10V" CAPC1005-STAR#1 -300,3851.36 r0 bottom locked (schematic designator C1)
C9 "1uF 10V" CAPC1005-STAR#1 -300,3685 r0 bottom locked (schematic designator C2)
C10 "1uF 10V" CAPC1005-STAR#1 -200,3795.91 r0 bottom locked (schematic designator C3)
C11 "1uF 10V" CAPC1005-STAR#1 -200,3625 r180 bottom locked (schematic designator C4)
C12 "1uF 10V" CAPC1005-STAR#1 -200,3962.27 r180 bottom locked (schematic designator C5)
C13 "4.7nF 10V" CAPC1005-STAR#1 -300,3906.82 r0 bottom locked (schematic designator C6)
C14 "1uF 10V" CAPC1005-STAR#1 -200,4073.18 r0 bottom locked (schematic designator C7)
C15 "1uF 10V" CAPC1005-STAR#1 -200,4128.64 r0 bottom locked (schematic designator C8)
C16 "1uF 10V" CAPC1005-STAR#1 -200,4184.09 r0 bottom locked (schematic designator C9)
C17 "1uF 10V" CAPC1005-STAR#1 -300,4295 r0 bottom locked (schematic designator C10)
C18 "4.7nF 10V" CAPC1005-STAR#1 -200,4239.55 r0 bottom locked (schematic designator C12)
C19 "10uF 10V" CAPC2012-STAR 110,2665 r0 bottom locked (schematic designator C1)
C20 "10uF 10V" CAPC2012-STAR -320,2665 r0 bottom locked (schematic designator C2)
C21 "100nF 16V" CAPC1005-STAR#1 -320,2745 r0 bottom locked (schematic designator C3)
C22 "100nF 16V" CAPC1005-STAR#1 110,2745 r0 bottom locked (schematic designator C4)
C23 "10uF 10V" CAPC2012-STAR 110,2525 r0 bottom locked (schematic designator C5)
C24 "100nF 16V" CAPC1005-STAR#1 110,2595 r180 bottom locked (schematic designator C6)
C25 "10uF 10V" CAPC2012-STAR 110,2385.63 r0 bottom locked (schematic designator C7)
C26 "100nF 16V" CAPC1005-STAR#1 110,2455.63 r0 bottom locked (schematic designator C8)
C27 "10uF 10V" CAPC2012-STAR -75,2525 r0 bottom locked (schematic designator C9)
C28 "220pF 50V 1005 COG" CAPC1005-STAR#1 -75,2595 r0 bottom locked (schematic designator C10)
C29 "10nF 16V" CAPC1005-STAR#1 110,2795 r180 bottom locked (schematic designator C11)
C30 "10nF 16V" CAPC1005-STAR#1 110,2895 r180 bottom locked (schematic designator C12)
C31 "10uF 10V" CAPC2012-STAR -75,2760 r0 bottom locked (schematic designator C13)
C32 "220pF 50V 1005 COG" CAPC1005-STAR#1 -75,2837.5 r0 bottom locked (schematic designator C14)
C33 "15pF 50V" CAPC1005-STAR#1 7930,3995 r0 top locked (schematic designator C1)
C34 "15pF 50V" CAPC1005-STAR#1 8045,3995 r180 top locked (schematic designator C2)
C35 "0.1uF 16V" CAPC1005-STAR#1 7926.65,3525 r180 top locked (schematic designator C4)
C36 "10uF 20V" CAPC3528-STAR#1 8125,3255 r90 top locked (schematic designator C3)
C37 "0.1uF 16V" CAPC1005-STAR#1 4078,949 r180 bottom (schematic designator C1)
C38 "0.1uF 16V" CAPC1005-STAR#1 3829,1075 r90 bottom locked (schematic designator C2)
C39 "0.1uF 16V" CAPC1005-STAR#1 7930,2510 r0 bottom locked (schematic designator C1)
C40 "10uF 20V" CAPC3528-STAR#1 2975,5205 r270 bottom locked (schematic designator C1)
C41 "0.1uF 25V" CAPC1005-STAR#1 3125,5345 r180 bottom locked (schematic designator C2)
C42 "0.1uF 25V" CAPC1005-STAR#1 3125,5120 r0 bottom locked (schematic designator C3)
C43 "0.1uF 25V" CAPC1005-STAR#1 2125,6045 r180 bottom locked (schematic designator C4)
C44 "0.1uF 25V" CAPC1005-STAR#1 2415,5730 r0 bottom locked (schematic designator C5)
C45 "22pF 50V" CAPC1005-STAR#1 2635,5680 r0 bottom locked (schematic designator C6)
C46 "22pF 50V" CAPC1005-STAR#1 2635,5380 r180 bottom locked (schematic designator C7)
C47 "0.1uF 25V" CAPC1005-STAR#1 2415,5780 r180 bottom locked (schematic designator C8)
C48 "0.1uF 25V" CAPC1005-STAR#1 2595,6045 r180 bottom locked (schematic designator C9)
C49 "10uF 20V" CAPC3528-STAR#1 2975,5585 r270 bottom locked (schematic designator C10)
C50 "0.1uF 25V" CAPC1005-STAR#1 2080,5400 r0 bottom locked (schematic designator C11)
C51 "0.1uF 25V" CAPC1005-STAR#1 2635,5265 r180 bottom locked (schematic designator C12)
C52 "0.1uF 25V" CAPC1005-STAR#1 3125,5725 r180 bottom locked (schematic designator C13)
C53 "0.1uF 25V" CAPC1005-STAR#1 3125,5500 r0 bottom locked (schematic designator C14)
C54 "0.1uF 25V" CAPC1005-STAR#1 3470,5405 r180 bottom locked (schematic designator C15)
C55 "0.1uF 16V" CAPC1005-STAR#1 8165,4610 r270 top locked (schematic designator C1)
C56 "0.1uF 16V" CAPC1005-STAR#1 8165,4475 r270 top locked (schematic designator C2)
C57 "10nF 16V" CAPC1005-STAR#1 8165,4305 r90 top locked (schematic designator C3)
C58 "10nF 16V" CAPC1005-STAR#1 7535,4605 r90 top locked (schematic designator C4)
C59 "10nF 16V" CAPC1005-STAR#1 7535,4465 r90 top locked (schematic designator C5)
C60 "0.1uF 16V" CAPC1005-STAR#1 7535,4310 r90 top locked (schematic designator C6)
C61 "10uF 20V" CAPC3528-STAR#1 3545,1125 r180 bottom locked (schematic designator C1)
C62 "10uF 20V" CAPC3528-STAR#1 2955,1125 r180 bottom locked (schematic designator C1)
C63 "0.1uF 16V" CAPC1005-STAR#1 7385,3698.78 r90 top locked (schematic designator C1)
C64 "0.1uF 16V" CAPC1005-STAR#1 7385,3839.49 r90 top locked (schematic designator C2)
C65 "0.1uF 16V" CAPC1005-STAR#1 6740,4055.15 r270 top locked (schematic designator C3)
C66 "0.1uF 16V" CAPC1005-STAR#1 6740,3839.49 r90 top locked (schematic designator C4)
C67 "10nF 16V" CAPC1005-STAR#1 6740,3698.78 r270 top locked (schematic designator C5)
C68 "10nF 16V" CAPC1005-STAR#1 6740,3474.85 r90 top locked (schematic designator C6)
C69 "10nF 16V" CAPC1005-STAR#1 7385,4055.15 r90 top locked (schematic designator C7)
C70 "10nF 16V" CAPC1005-STAR#1 7385,3474.85 r90 top locked (schematic designator C8)
C71 "0.1uF 16V" CAPC1005-STAR#1 6735,4428.59 r270 bottom locked (schematic designator C1_SM)
C72 "0.1uF 16V" CAPC1005-STAR#1 7385,4710 r90 bottom locked (schematic designator C2_SM)
C73 "10nF 16V" CAPC1005-STAR#1 6735,4850.71 r270 bottom locked (schematic designator C3_SM)
C74 "10nF 16V" CAPC1005-STAR#1 7385,4569.29 r90 bottom locked (schematic designator C4_SM)
C75 "0.1uF 16V" CAPC1005-STAR#1 6735,4569.29 r90 bottom locked (schematic designator C1_SM)
C76 "0.1uF 16V" CAPC1005-STAR#1 7385,4428.59 r270 bottom locked (schematic designator C2_SM)
C77 "10nF 16V" CAPC1005-STAR#1 6735,4710 r90 bottom locked (schematic designator C3_SM)
C78 "10nF 16V" CAPC1005-STAR#1 7385,4850.71 r90 bottom locked (schematic designator C4_SM)
C79 "0.1uF 16V" CAPC1005-STAR#1 6735,4850.71 r270 top locked (schematic designator C1)
C80 "0.1uF 16V" CAPC1005-STAR#1 6735,4710 r90 top locked (schematic designator C2)
C81 "0.1uF 16V" CAPC1005-STAR#1 7385,4428.59 r270 top locked (schematic designator C3)
C82 "0.1uF 16V" CAPC1005-STAR#1 7385,4850.71 r90 top locked (schematic designator C4)
C83 "10nF 16V" CAPC1005-STAR#1 6735,4569.29 r90 top locked (schematic designator C5)
C84 "10nF 16V" CAPC1005-STAR#1 6735,4428.59 r270 top locked (schematic designator C6)
C85 "10nF 16V" CAPC1005-STAR#1 7385,4710 r90 top locked (schematic designator C7)
C86 "10nF 16V" CAPC1005-STAR#1 7385,4569.29 r90 top locked (schematic designator C8)
C87 "4.7nF 250V" CAPM7163 442.24,1125 r270 bottom locked (schematic designator C169)
C88 "0.1uF 16V" CAPC1005-STAR#1 7470,1115 r180 bottom locked (schematic designator C2)
C89 "10uF 20V" CAPC3528-STAR#1 7390,1215 r0 bottom locked (schematic designator C6)
C90 "0.1uF 16V" CAPC1005-STAR#1 7515,495 r0 bottom locked (schematic designator C3)
C91 "0.1uF 16V" CAPC1005-STAR#1 7295,990 r180 bottom locked (schematic designator C4)
C92 "0.1uF 16V" CAPC1005-STAR#1 7400,990 r0 bottom locked (schematic designator C5)
C93 "10uF 20V" CAPC3528-STAR#1 7390,1374 r0 bottom locked (schematic designator C7)
C94 "0.1uF 16V" CAPC1005-STAR#1 7270,515 r180 bottom locked (schematic designator C8)
C95 "0.1uF 16V" CAPC1005-STAR#1 7280,1115 r0 bottom locked (schematic designator C9)
C96 "0.1uF 16V" CAPC1005-STAR#1 5060,5330 r0 bottom locked (schematic designator C1)
C97 "0.1uF 16V" CAPC1005-STAR#1 5075,5805 r180 bottom locked (schematic designator C2)
C98 "0.1uF 16V" CAPC1005-STAR#1 5420,5430 r0 bottom locked (schematic designator C3)
C99 "10uF 10V" CAPC2012-STAR 5445,5515 r180 bottom locked (schematic designator C4)
C100 "0.1uF 16V" CAPC1005-STAR#1 4900,5680 r180 bottom locked (schematic designator C5)
C101 "33nF 25V" CAPC1005-STAR#1 2405.87,5415 r0 top locked (schematic designator C1)
C102 "33nF 25V" CAPC1005-STAR#1 2550.87,5260 r180 top locked (schematic designator C2)
C103 "33nF 25V" CAPC1005-STAR#1 2405.87,5260 r0 top locked (schematic designator C3)
C104 "33nF 25V" CAPC1005-STAR#1 2550.87,5415 r180 top locked (schematic designator C4)
C105 "0.1uF 16V" CAPC1005-STAR#1 -182.03,5444.25 r0 bottom locked (schematic designator C15)